# Altium PCB OmniCore_SDR.PcbDoc (part 1 of 13)
Units mil, origin at the board's own origin, x right, y up, seen from the top; angles counter-clockwise.
Board outline 4724.72 x 2755.91 mil, 8 copper layers (Top, GND 1, Layer 1, Layer 2, GND 2, Layer 3, Power, Bottom), stack 40.468 mil thick; 530 components, 427 nets, 2315 pads, 1715 vias.
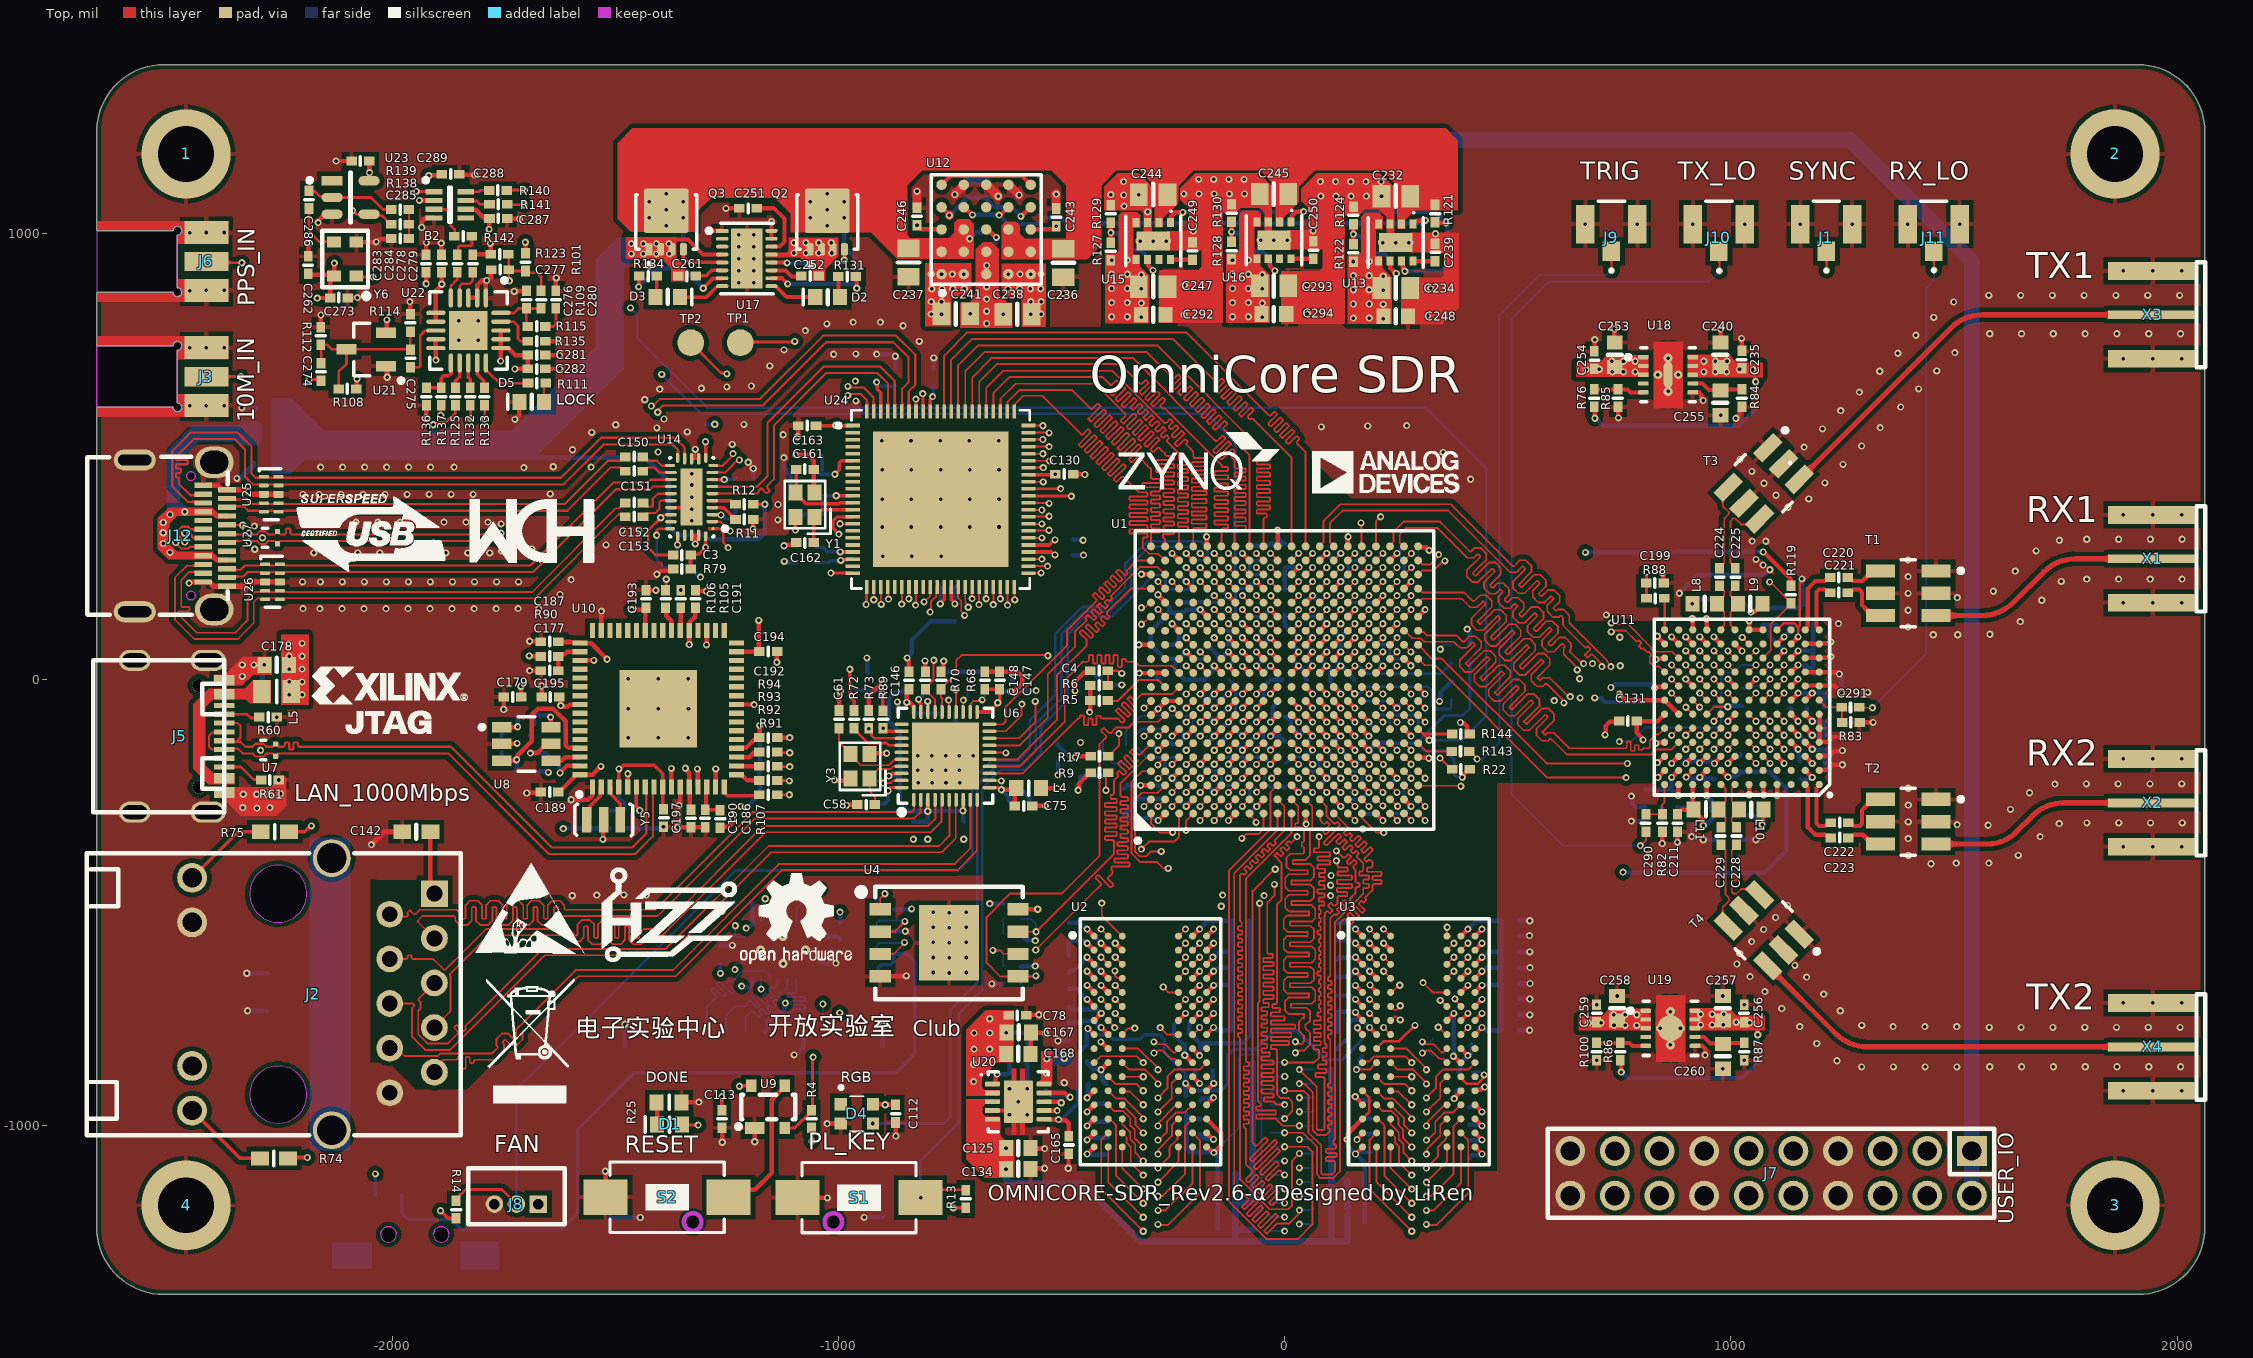
[diagram p0: Top view]
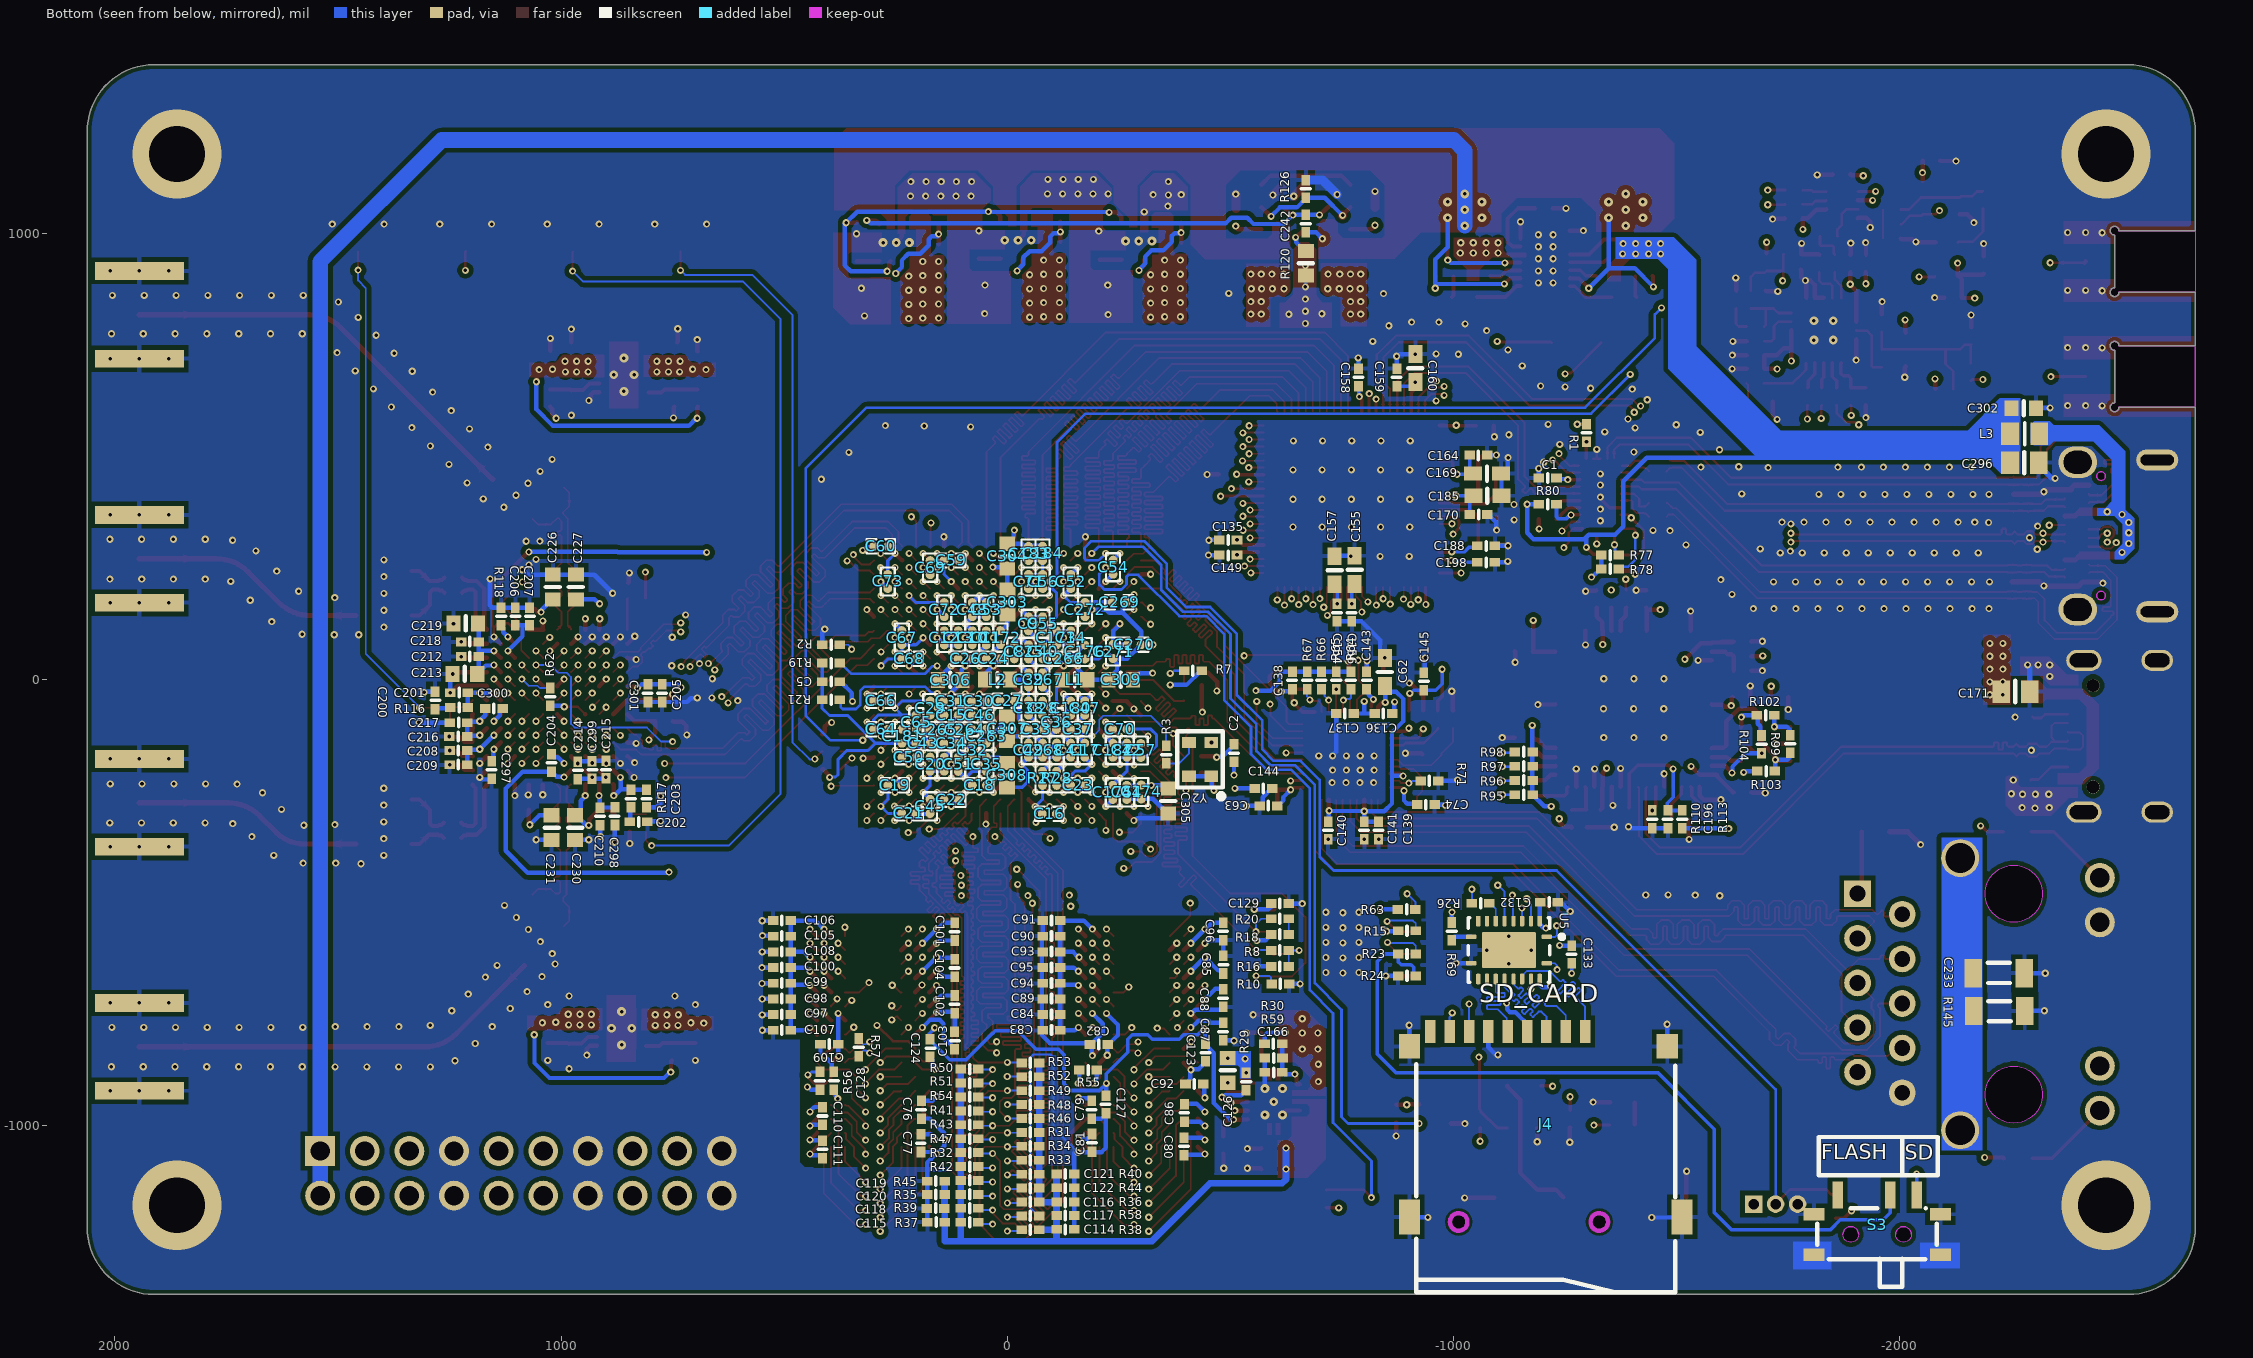
[diagram p1: Bottom view, seen from below]
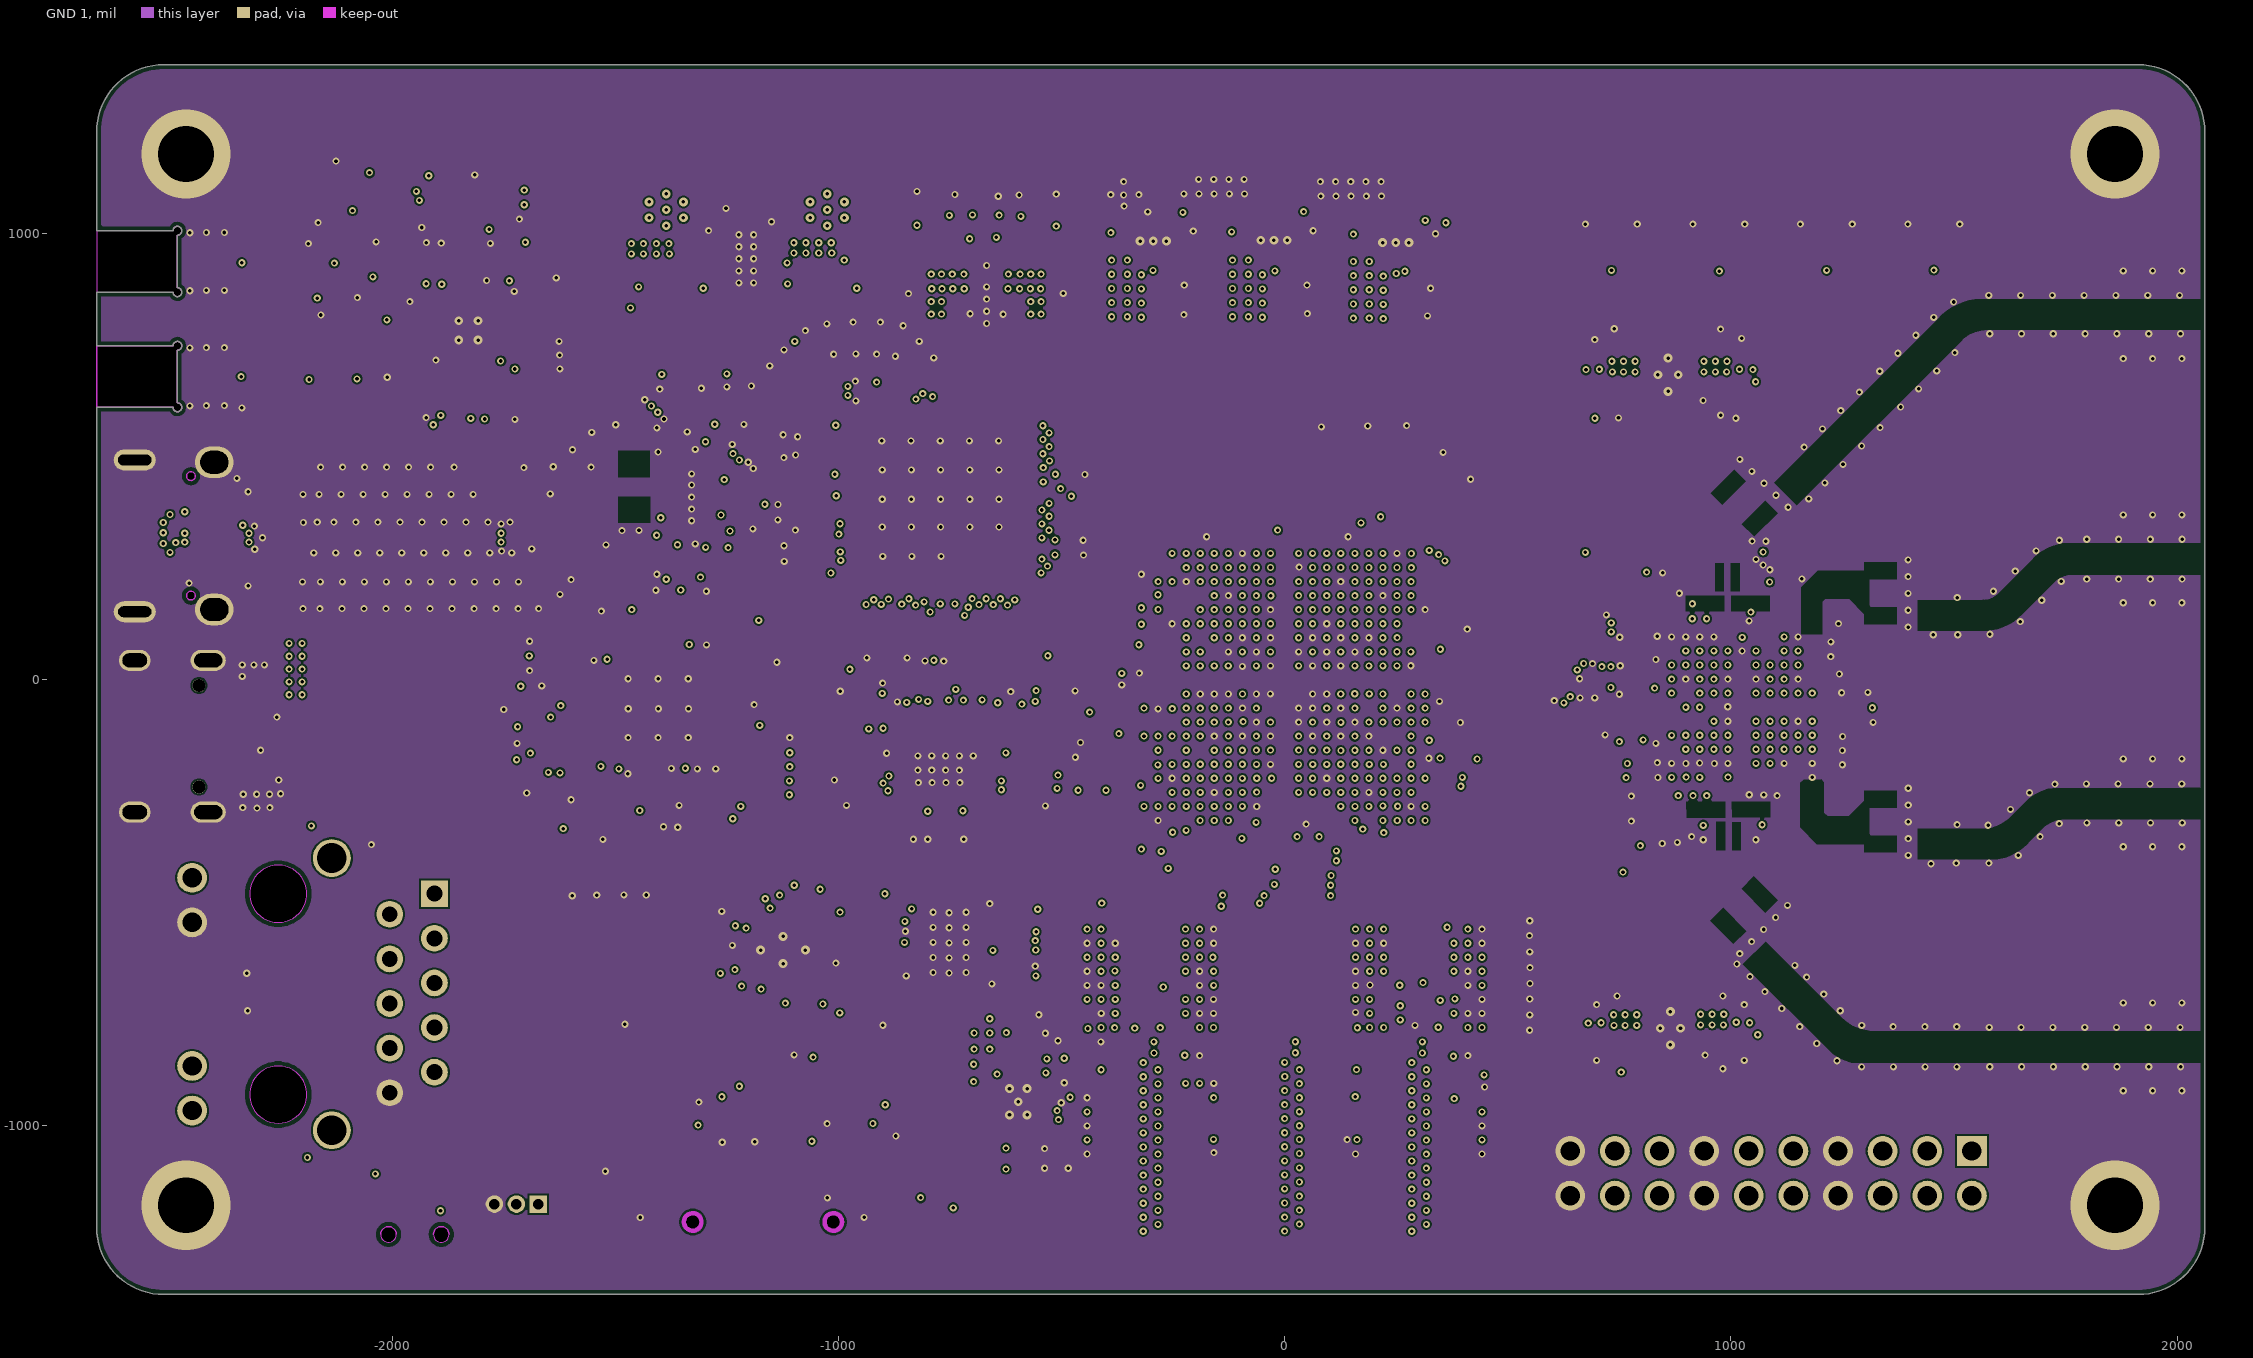
[diagram p2: GND 1]
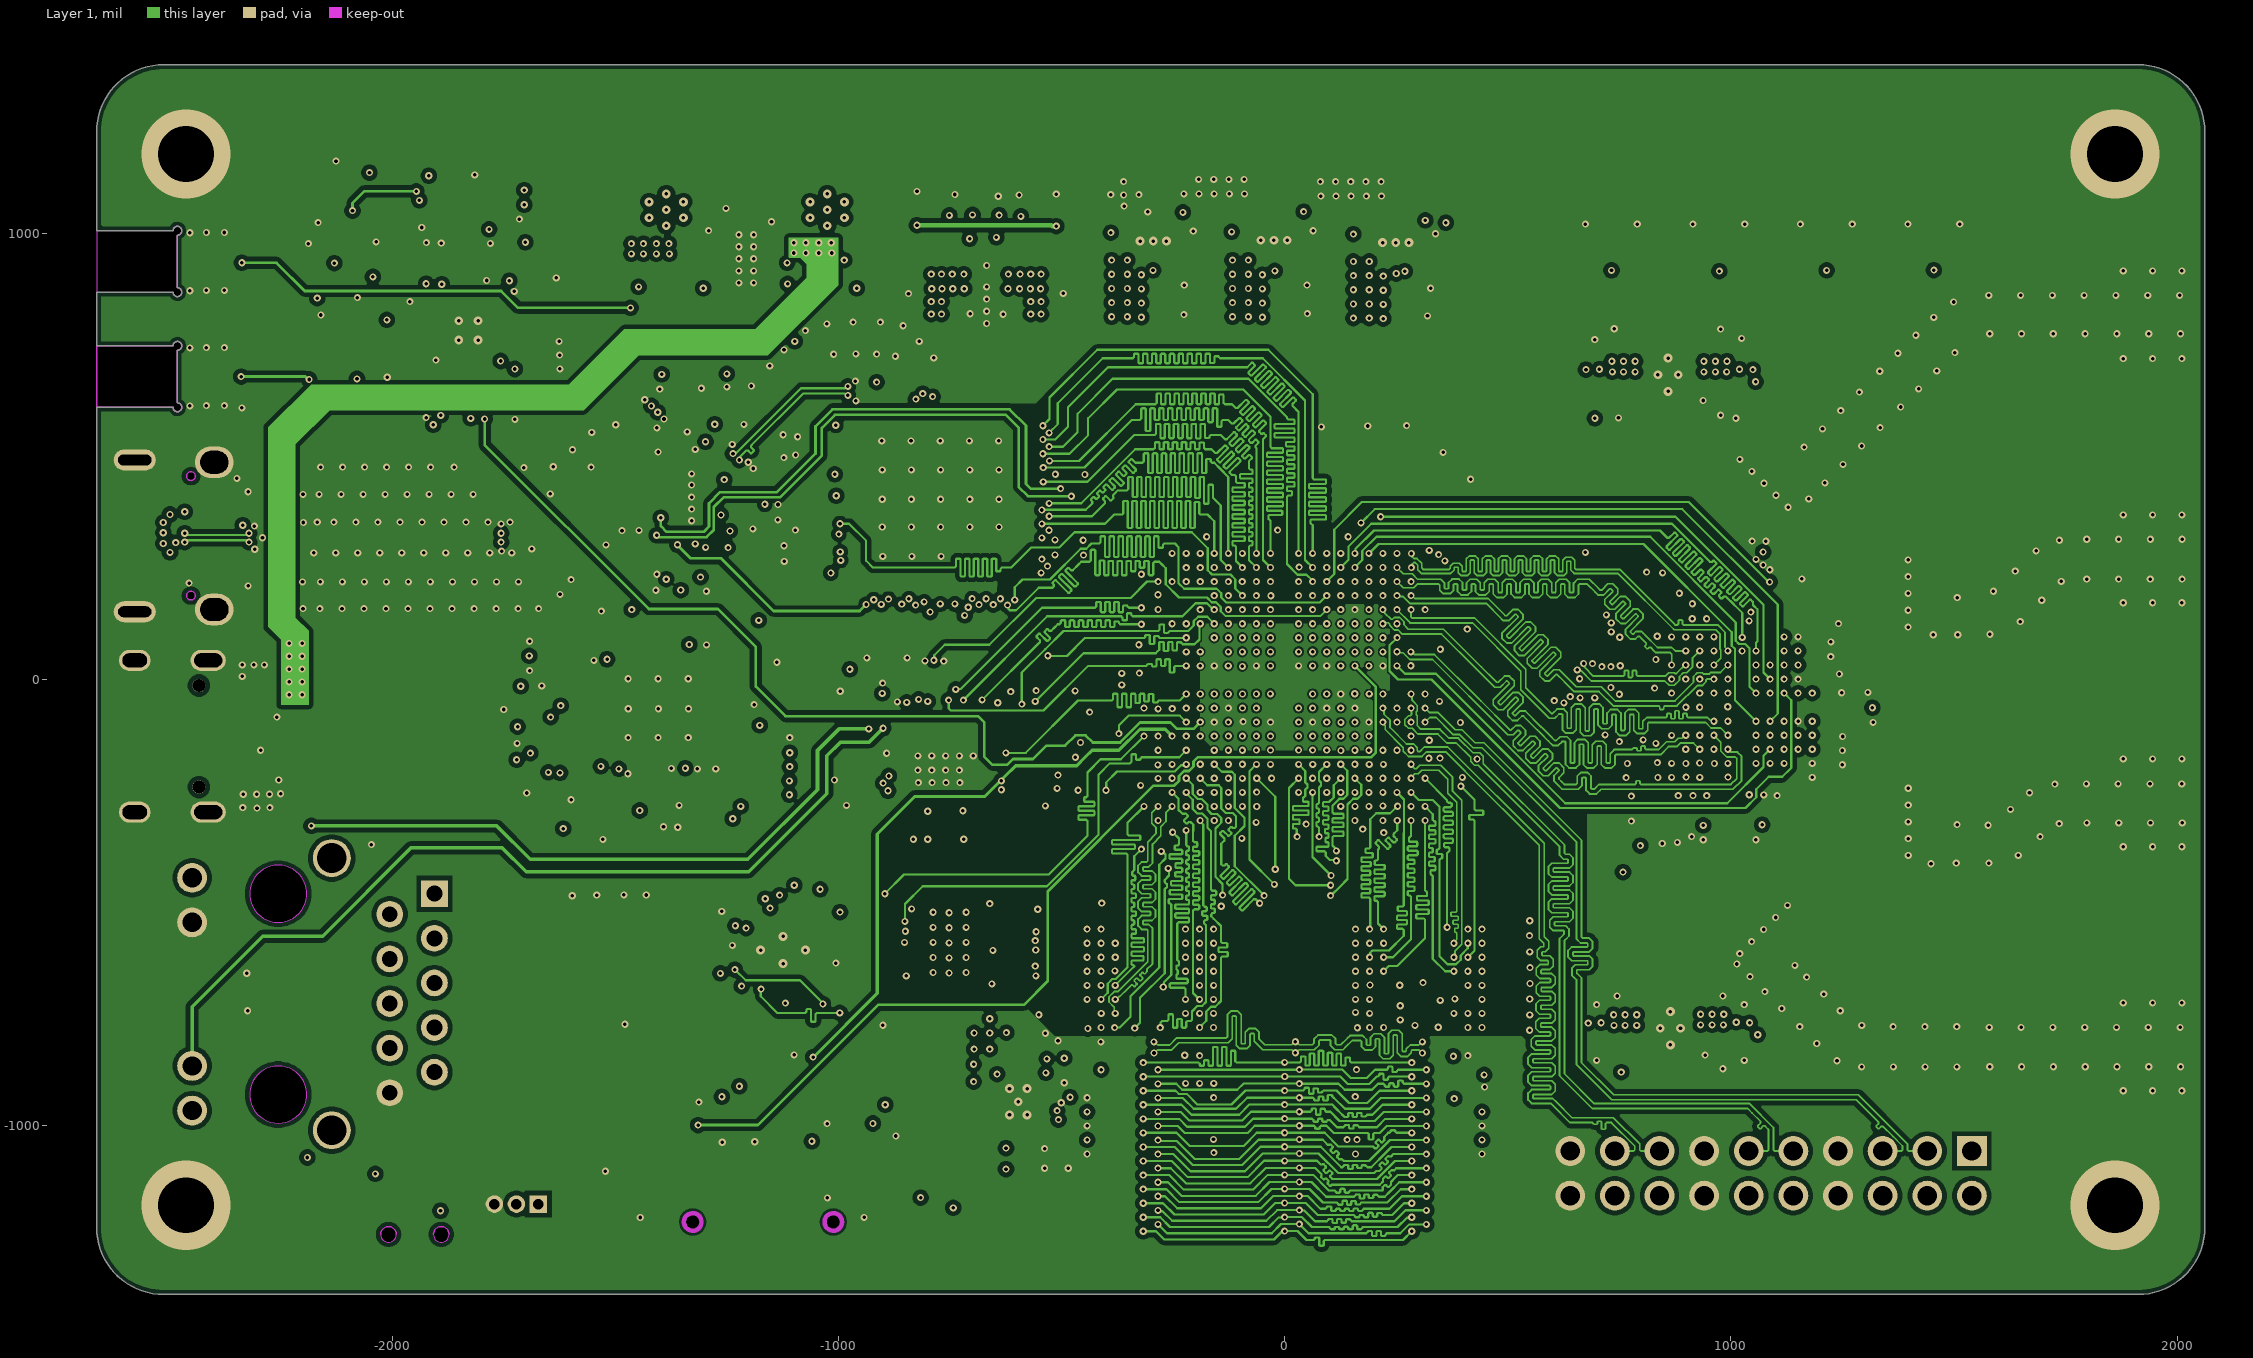
[diagram p3: Layer 1]
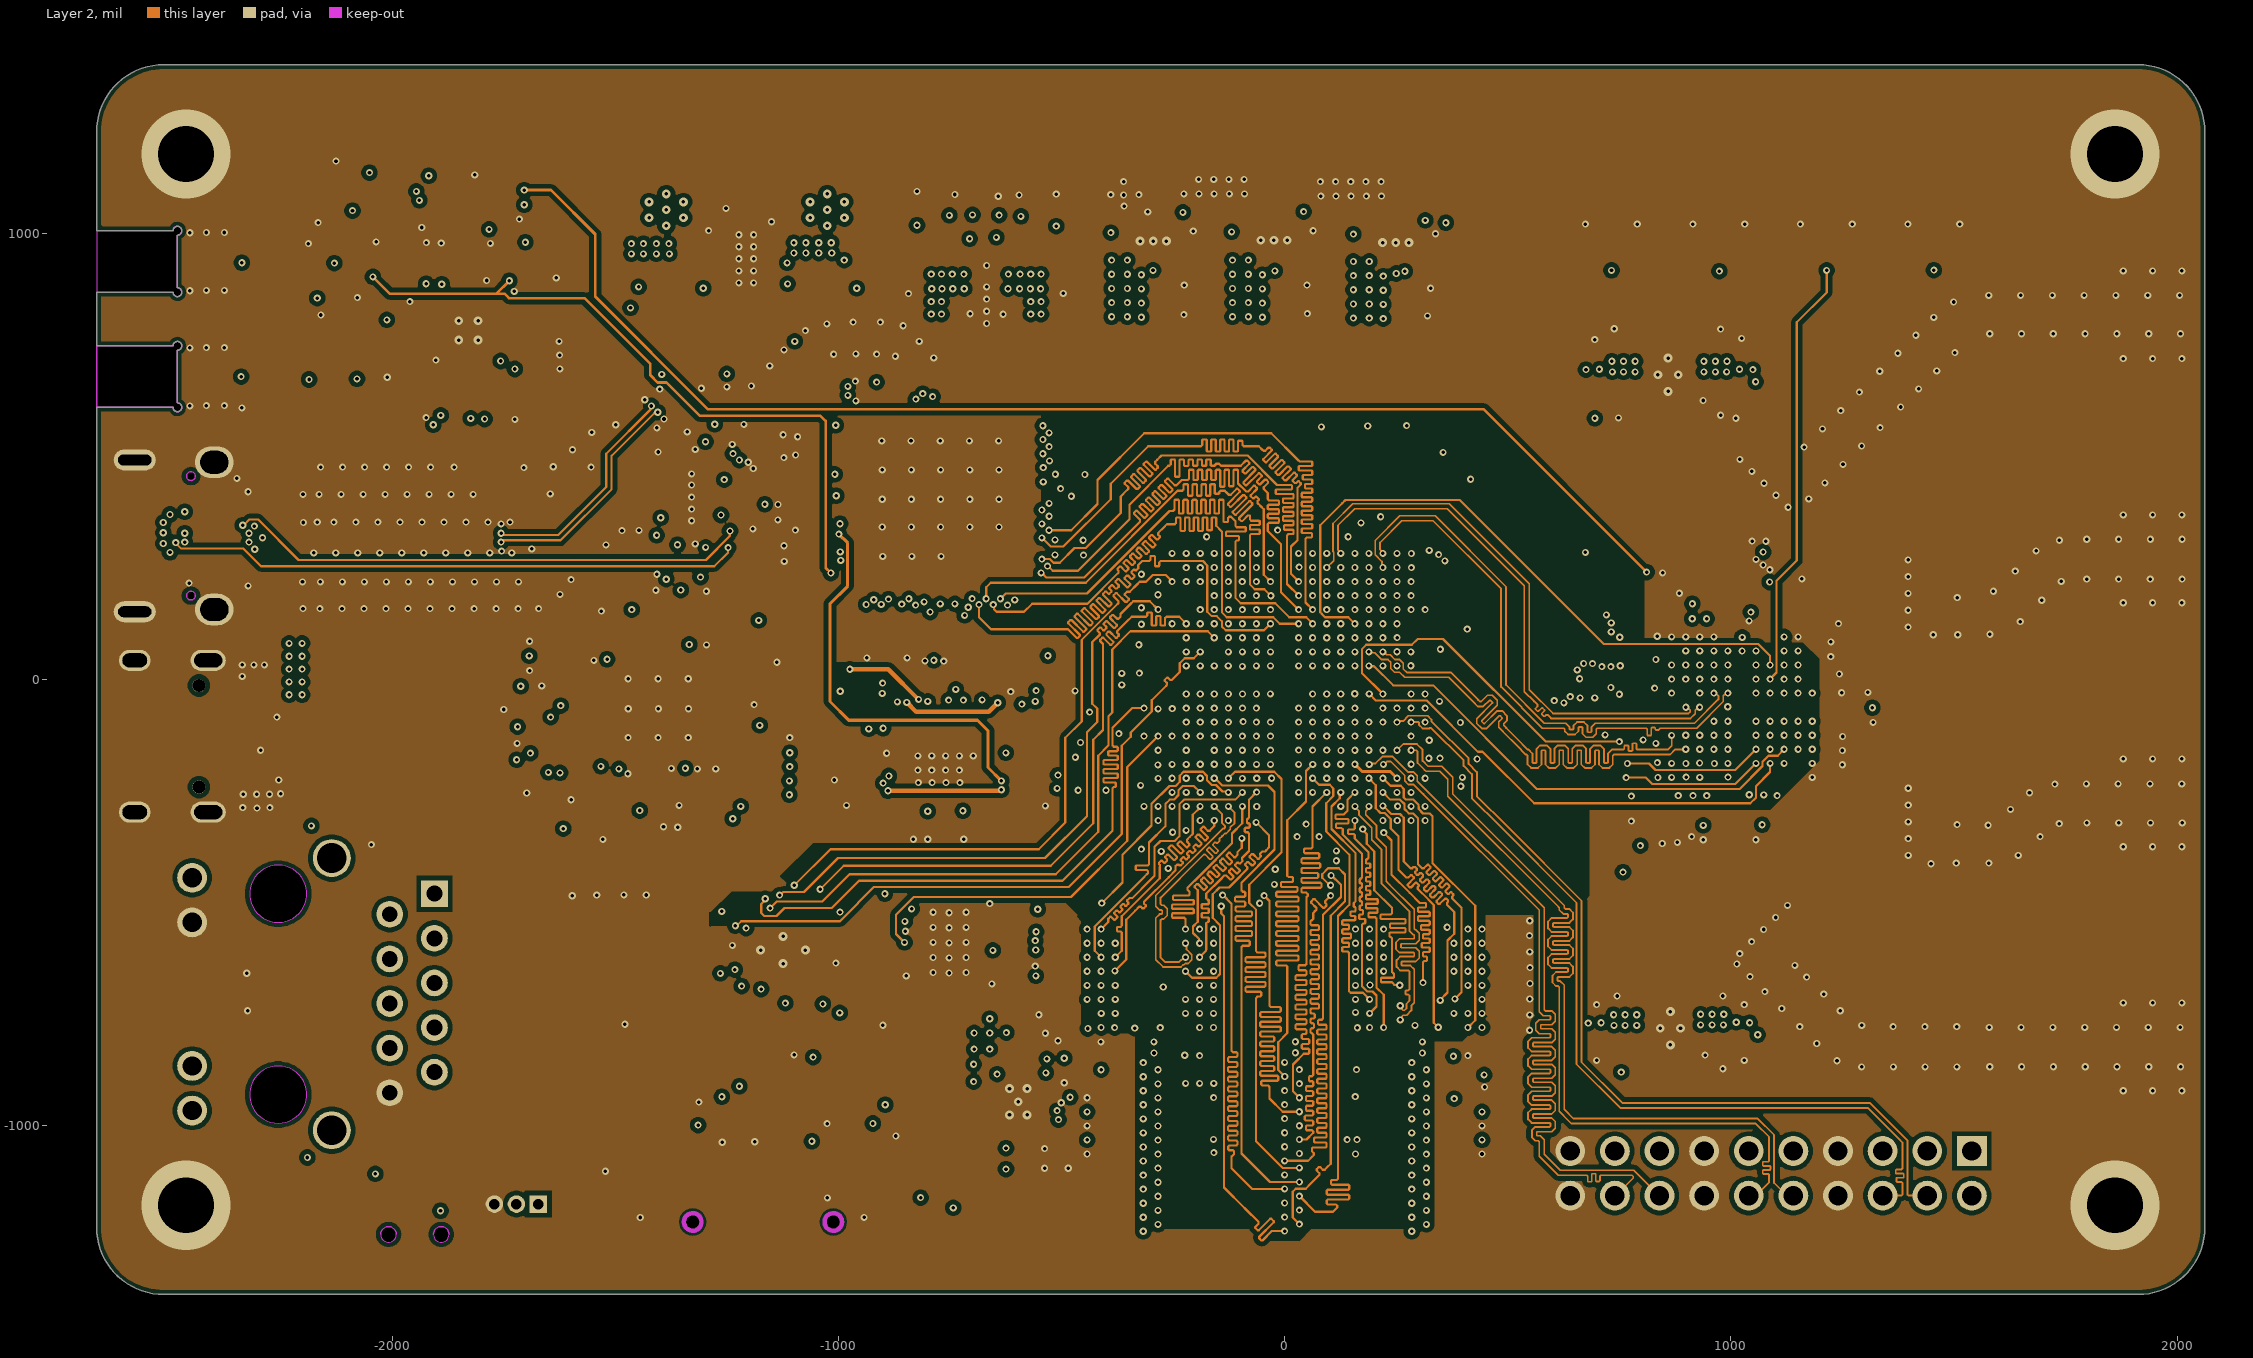
[diagram p4: Layer 2]
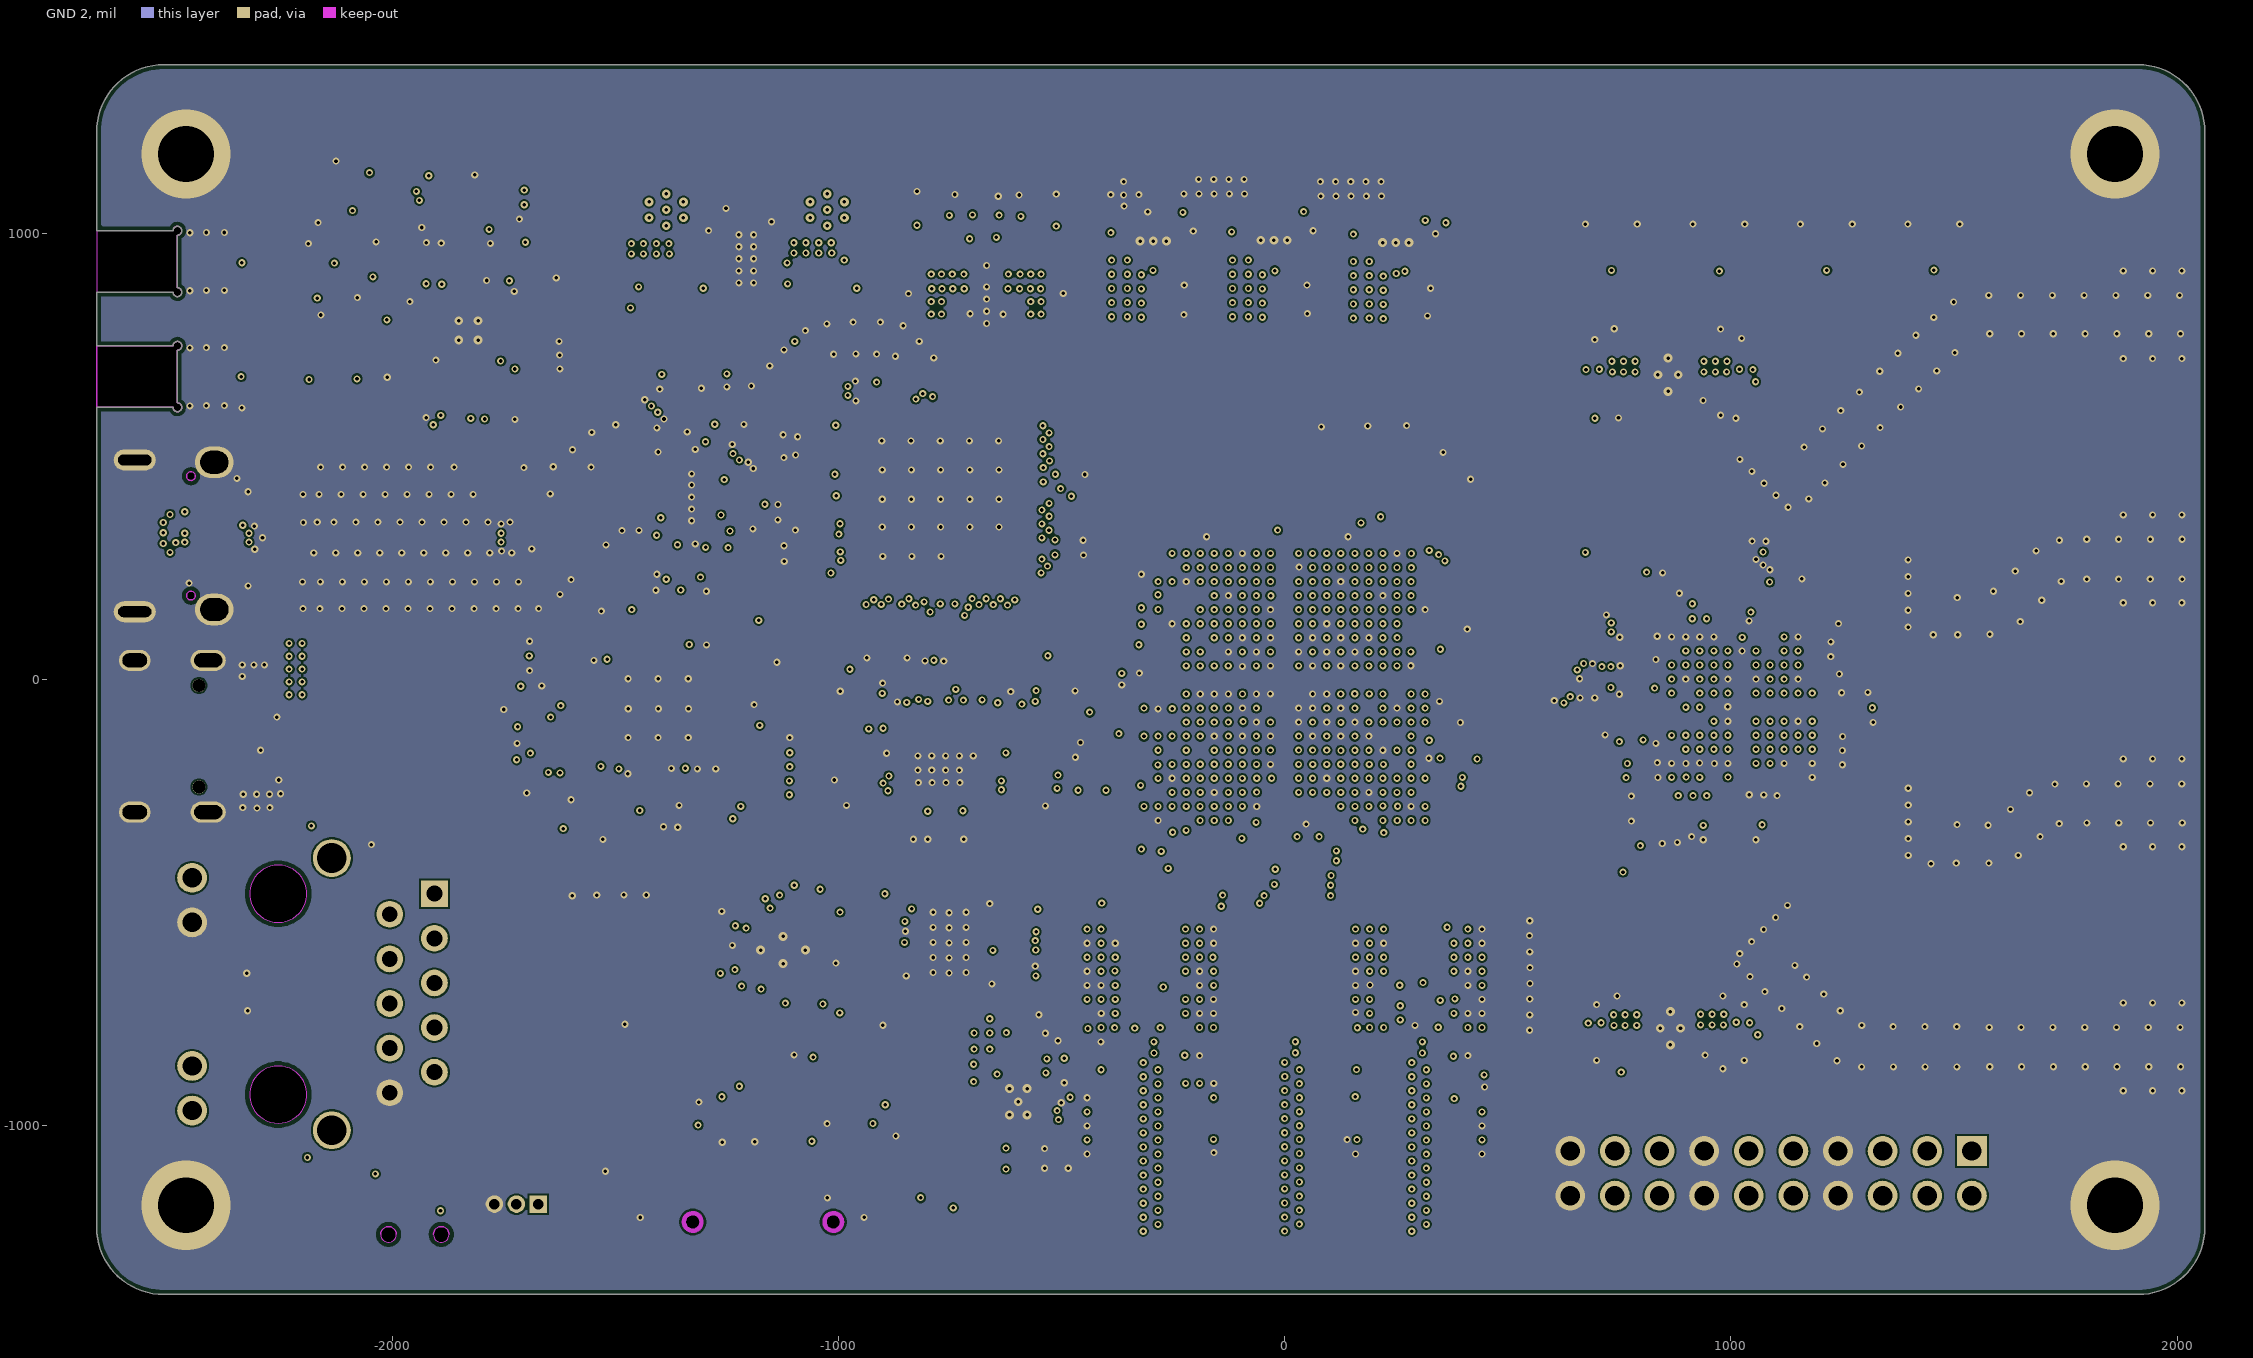
[diagram p5: GND 2]
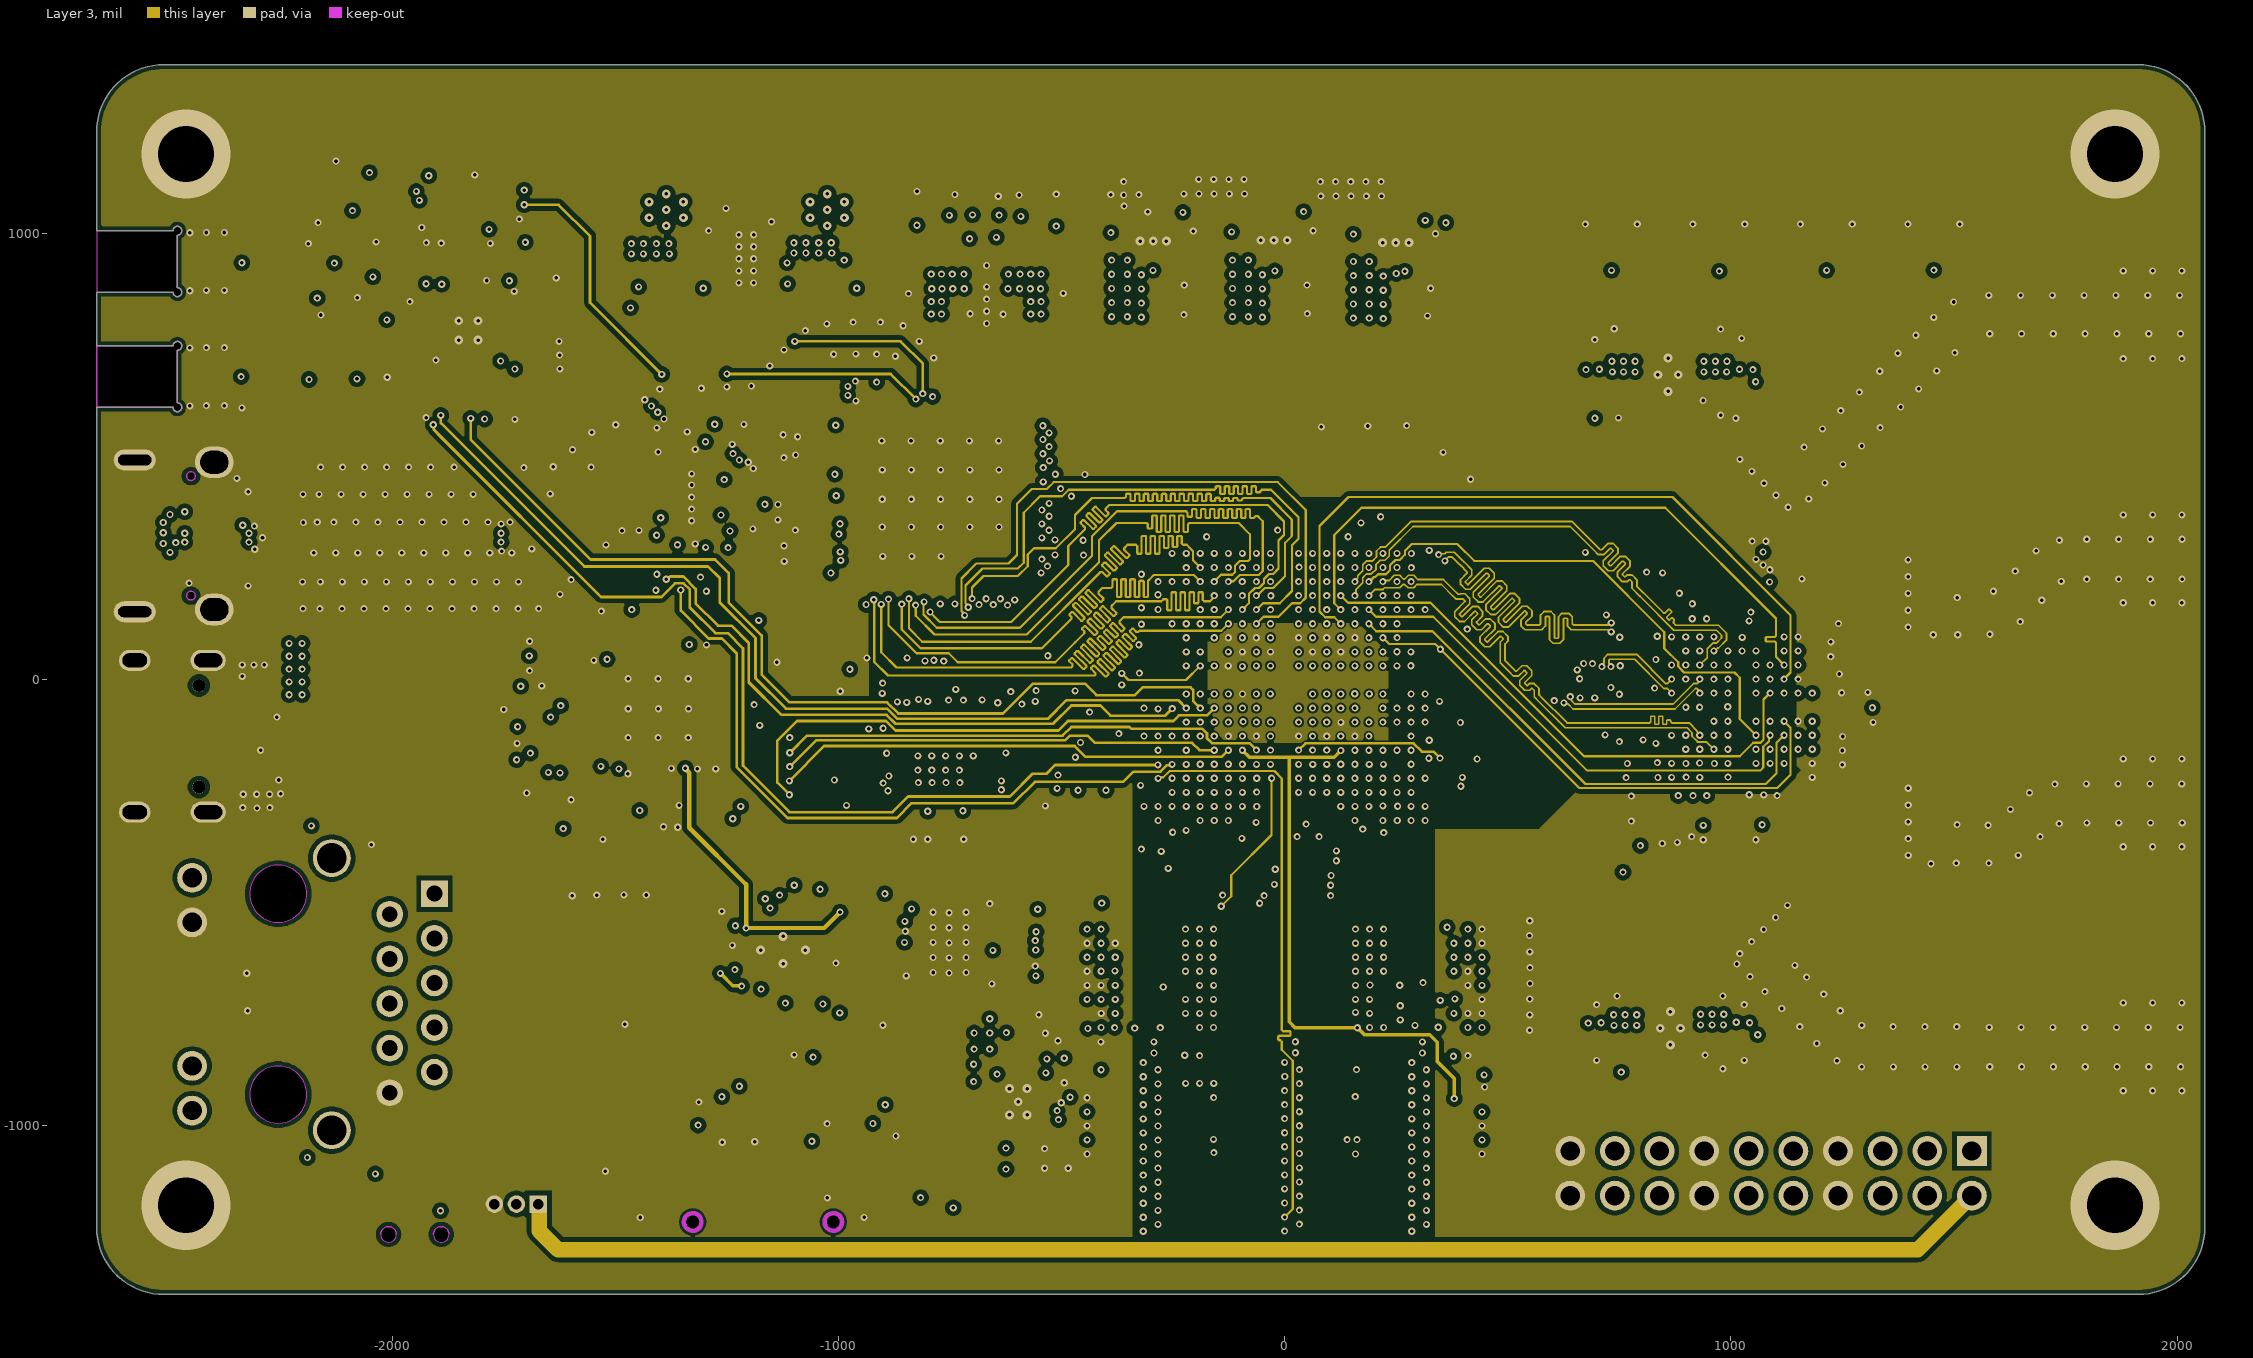
[diagram p6: Layer 3]
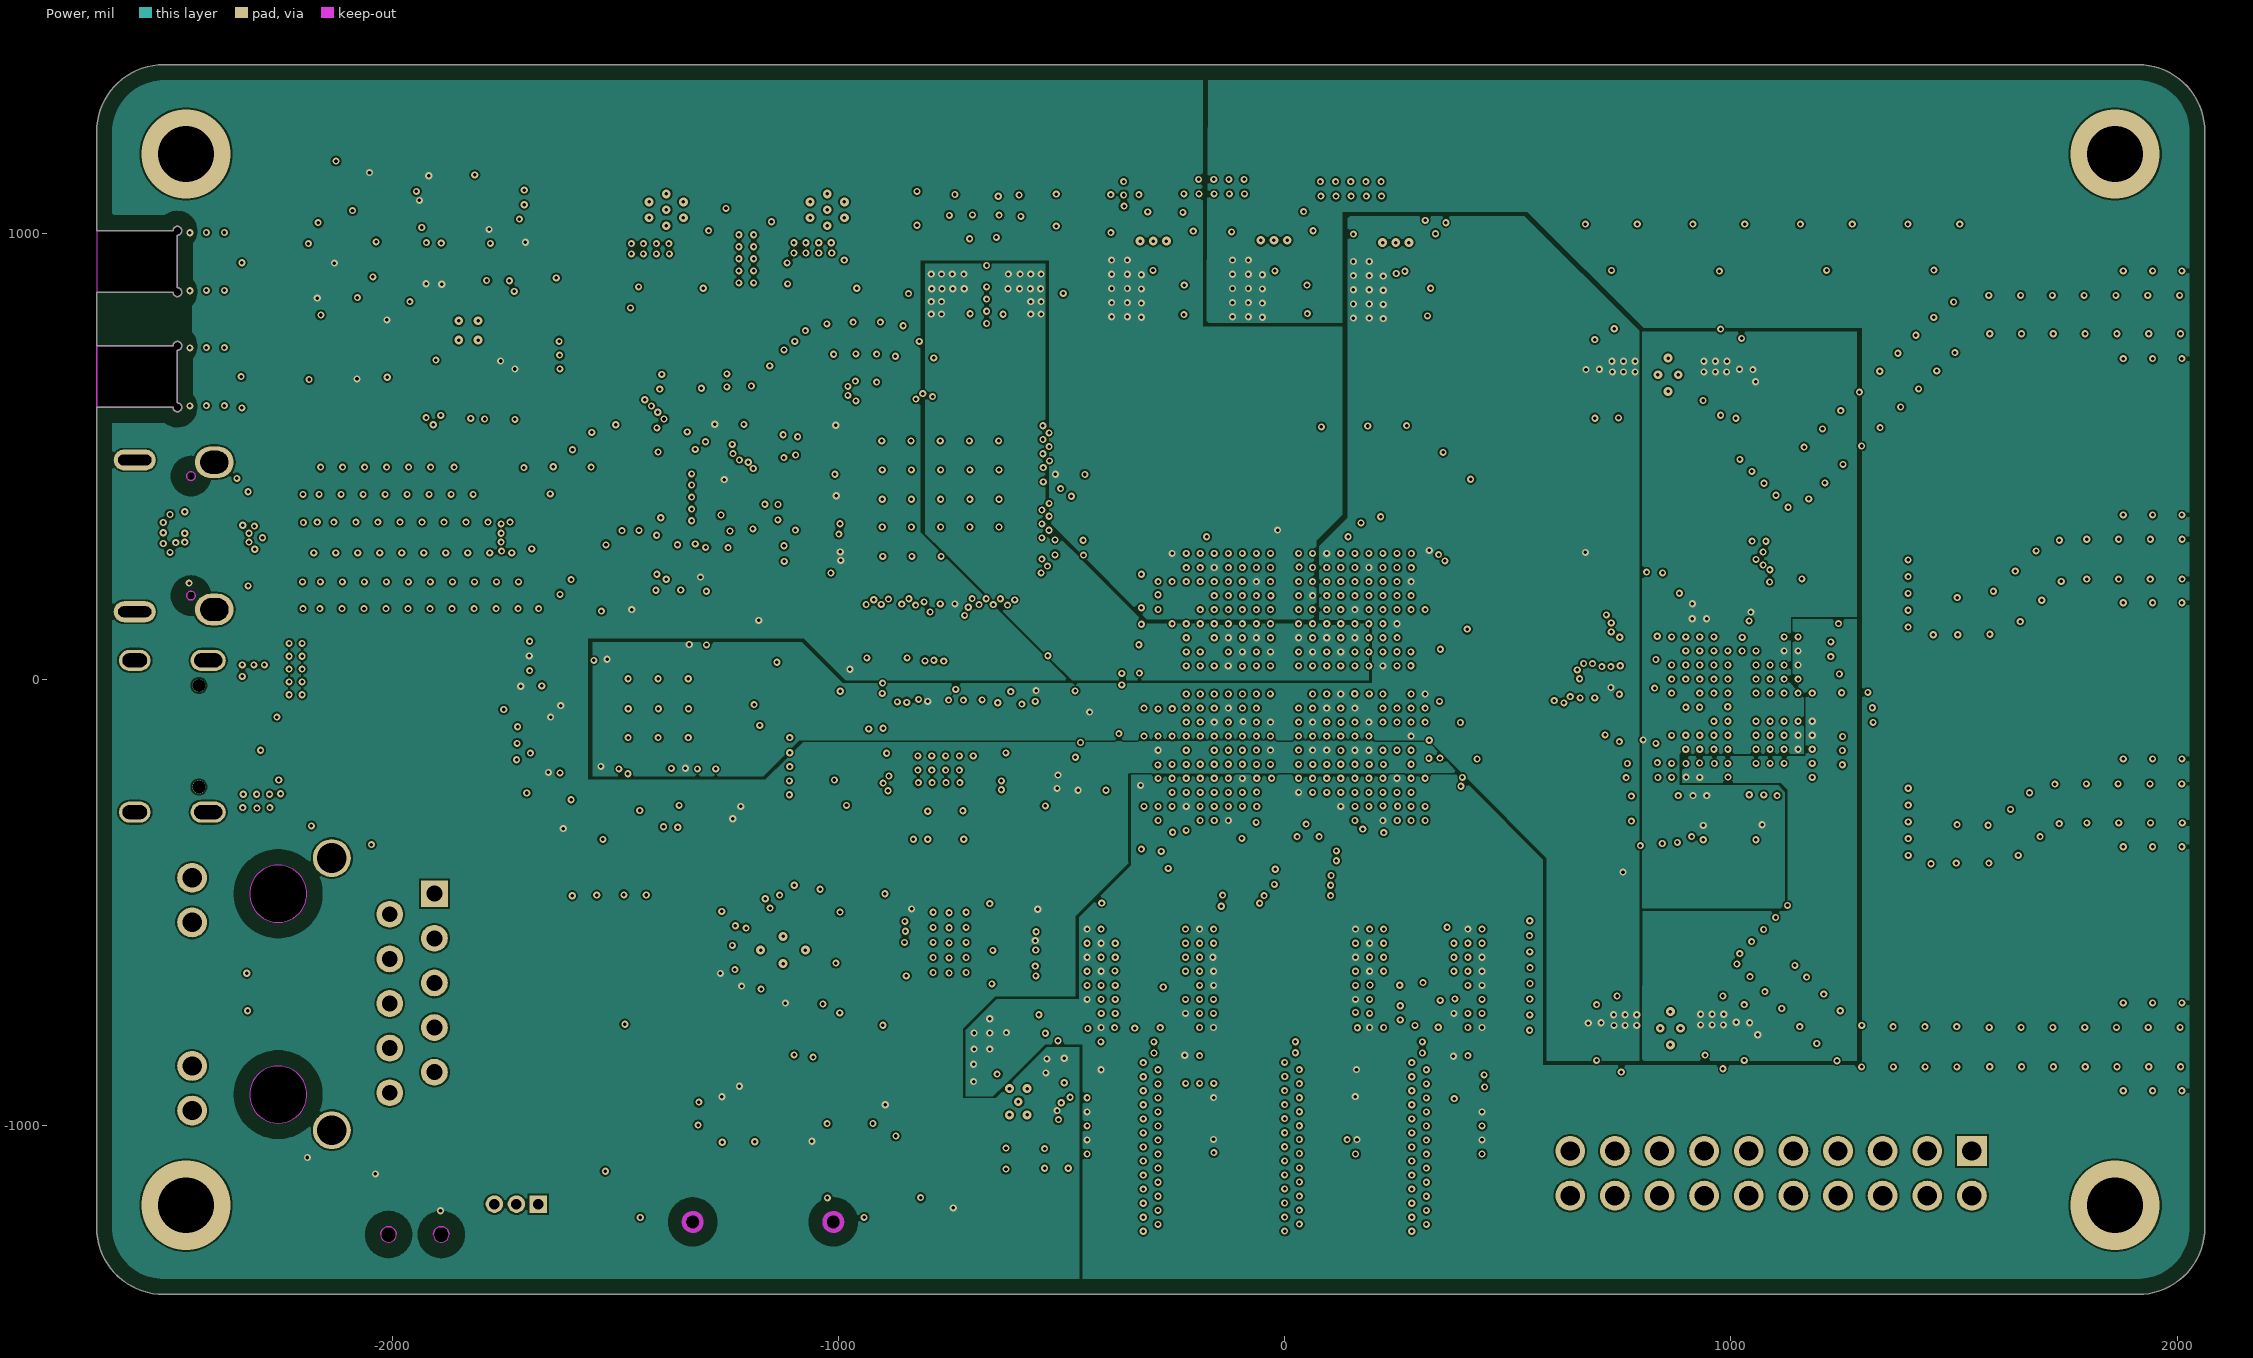
[diagram p7: Power]

## Layer stack, top to bottom
Top Solder: solder mask 0.4, Solder Resist, Dk 3.5
Top: signal copper 1.378
Dielectric 4: prepreg 2.8, PP-006, Dk 4.1
GND 1: signal copper 1.378
Dielectric 2: prepreg 2.8, PP-006, Dk 4.1
Layer 1: signal copper 1.378
Dielectric 6: prepreg 2.8, PP-006, Dk 4.1
Layer 2: signal copper 1.4
Dielectric 1: prepreg 12.6, FR-4, Dk 4.8
GND 2: signal copper 1.4
Dielectric 7: prepreg 2.8, PP-006, Dk 4.1
Layer 3: signal copper 1.378
Dielectric 3: prepreg 2.8, PP-006, Dk 4.1
Power: signal copper 1.378
Dielectric 5: prepreg 2.8, PP-006, Dk 4.1
Bottom: signal copper 1.378
Bottom Solder: solder mask 0.4, Solder Resist, Dk 3.5

## Board outline
-2662.2,-1227.95 -2662.2,610.12 -2491.26,610.12 ccw(c-2481.42,610.12) -2481.42,619.96 -2481.42,738.07 ccw(c-2481.42,747.91) -2491.26,747.91 -2662.2,747.91 -2662.2,868.11 -2491.26,868.11 ccw(c-2481.42,868.11) -2481.42,877.95 -2481.42,996.06 ccw(c-2481.42,1005.91) -2491.26,1005.91 -2662.52,1005.91 -2662.52,1227.95 -2662.2,1227.95 cw(c-2512.2,1227.95) -2512.2,1377.95 1912.2,1377.95 cw(c1912.2,1227.95) 2062.2,1227.95 2062.2,-1227.95 cw(c1912.2,-1227.95) 1912.2,-1377.95 -2512.2,-1377.95 cw(c-2512.2,-1227.95)
cut-out: -2662.52,610.12 -2662.52,747.91 -2491.26,747.91 cw(c-2481.42,747.91) -2481.42,738.07 -2481.42,619.96 cw(c-2481.42,610.12) -2491.26,610.12
cut-out: -2662.52,610.12 -2662.52,747.91 -2491.26,747.91 cw(c-2481.42,747.91) -2481.42,738.07 -2481.42,619.96 cw(c-2481.42,610.12) -2491.26,610.12

## Design rules (kind name [scope] priority, off if disabled: settings)
AssemblyTestpoint AssemblyTestpoint_1 [All] p1: testpointundercomponent=TRUE minsize=40 maxsize=100 preferedsize=60 minholesize=0 maxholesize=40 preferedholesize=32 testpointgrid=1 usegrid=TRUE gridtolerance=0.01 allowsidetop=TRUE allowsidebottom=TRUE
BoardOutlineClearance [OnLayer('Power')] p1: gap=35 ignorepadtopadclearanceinfootprint=FALSE
BoardOutlineClearance HZZ [All] p2: gap=10 ignorepadtopadclearanceinfootprint=FALSE
Clearance Clearance_9 [InNamedPolygon('GND_L06_P019')] p1: gap=10 ignorepadtopadclearanceinfootprint=FALSE
Clearance Clearance_8 [InNamedPolygon('GND_L04_P018')] p2: gap=10 ignorepadtopadclearanceinfootprint=FALSE
Clearance Clearance_7 [InNamedPolygon('GND_L03_P017')] p3: gap=10 ignorepadtopadclearanceinfootprint=FALSE
Clearance Clearance_6 [InNamedPolygon('GND_L06_P019')] p4: gap=10 ignorepadtopadclearanceinfootprint=FALSE
Clearance Clearance_5 [InNamedPolygon('GND_L04_P018')] p5: gap=10 ignorepadtopadclearanceinfootprint=FALSE
Clearance Clearance_4 [InNamedPolygon('GND_L03_P017')] p6: gap=10 ignorepadtopadclearanceinfootprint=FALSE
Clearance Clearance_3 [InNamedPolygon('GND_L08_P016')] p7: gap=10 ignorepadtopadclearanceinfootprint=FALSE
Clearance Clearance_2 [InNamedPolygon('GND_L01_P015')] p8: gap=10 ignorepadtopadclearanceinfootprint=FALSE
Clearance Clearance_1 [InComponent('J3') Or InComponent('J6')] p9: gap=0 ignorepadtopadclearanceinfootprint=TRUE
Clearance [All] p10: gap=4 ignorepadtopadclearanceinfootprint=FALSE
DiffPairsRouting DiffPair_DiffPairsRouting [All] p1: maxlimit=100 minlimit=4 mostfreqgap=7 toplayer_prefgap=10 toplayer_minwidth=4 toplayer_maxwidth=15 toplayer_prefwidth=4 midlayer1_minwidth=4 midlayer1_maxwidth=15 midlayer1_prefwidth=4 midlayer2_minwidth=4 midlayer2_maxwidth=15 midlayer2_prefwidth=4 midlayer3_minwidth=4 midlayer3_maxwidth=15 midlayer3_prefwidth=4 midlayer4_minwidth=4 midlayer4_maxwidth=15 midlayer4_prefwidth=4 midlayer5_minwidth=4 midlayer5_maxwidth=15 midlayer5_prefwidth=4 midlayer6_minwidth=4 midlayer6_maxwidth=15 midlayer6_prefwidth=4 bottomlayer_prefgap=10 bottomlayer_minwidth=4 bottomlayer_maxwidth=15 bottomlayer_prefwidth=4 maxuncoupledlength=40
FanoutControl Fanout_BGA [All] p1: bgadir=Out bgaviamode=Centered fanoutstyle=BGA fanoutdirection=Alternating viagrid=1 // Fanout_BGA (Default Rule)
Height [All] p1: minheight=0 maxheight=5000 prefheight=500
HoleSize [All] p1: absolutevalues=TRUE maxlimit=200 minlimit=6 maxpercent=80.000 minpercent=20.000
HoleToHoleClearance [All] p1: gap=6 allowstackedmicrovias=TRUE
MatchedLengths MatchedLengths_5 [InNetClass('AD9361_RF')] p1: tolerance=40 checknetsindiffpair=TRUE checkdiffpairvsdiffpair=FALSE checkxsignals=FALSE checkothers=FALSE
MatchedLengths MatchedLengths_2 [InNetClass('DDR_D4')] p2: tolerance=5 checknetsindiffpair=FALSE checkdiffpairvsdiffpair=TRUE checkxsignals=TRUE checkothers=TRUE
MatchedLengths MatchedLengths_4 [InNetClass('DDR_D3')] p3: tolerance=5 checknetsindiffpair=FALSE checkdiffpairvsdiffpair=TRUE checkxsignals=TRUE checkothers=TRUE
MatchedLengths MatchedLengths_3 [InNetClass('DDR_D2')] p4: tolerance=5 checknetsindiffpair=FALSE checkdiffpairvsdiffpair=TRUE checkxsignals=TRUE checkothers=TRUE
MatchedLengths MatchedLengths_1 [InNetClass('DDR_D1')] p5: tolerance=5 checknetsindiffpair=FALSE checkdiffpairvsdiffpair=TRUE checkxsignals=TRUE checkothers=TRUE
MatchedLengths [InxSignalClass('All xSignals')] p6: tolerance=10 checknetsindiffpair=FALSE checkdiffpairvsdiffpair=TRUE checkxsignals=TRUE checkothers=TRUE targetsourcename=DDR3_A3_PP1
MatchedLengths DiffPair_MatchedLengths [Not InNetClass('AD9361_RF')] p7: tolerance=5 checknetsindiffpair=TRUE checkdiffpairvsdiffpair=FALSE checkxsignals=FALSE checkothers=FALSE
MinimumSolderMaskSliver [All] p1: minsoldermaskwidth=0
PlaneConnect PlaneConnect_1 [All] p1: planeconnectstyle=Relief reliefexpansion=20 reliefentries=4 reliefconductorwidth=10 reliefairgap=10
PolygonConnect PolygonConnect_22 [All vs IsNamedPolygon('GND_L05_P013')] p1: thpad.connectstyle=Direct thpad.reliefconductorwidth=10 thpad.reliefentries=4 thpad.polygonreliefangle="90 Angle" thpad.airgapwidth=10 smdpad.connectstyle=Relief smdpad.reliefconductorwidth=10 smdpad.reliefentries=4 smdpad.polygonreliefangle="90 Angle" smdpad.airgapwidth=10 via.connectstyle=Direct via.reliefconductorwidth=10 via.reliefentries=4 via.polygonreliefangle="90 Angle" via.airgapwidth=10
PolygonConnect PolygonConnect_21 [All vs IsNamedPolygon('GND_L03_P017')] p2: thpad.connectstyle=Direct thpad.reliefconductorwidth=10 thpad.reliefentries=4 thpad.polygonreliefangle="90 Angle" thpad.airgapwidth=10 smdpad.connectstyle=Relief smdpad.reliefconductorwidth=10 smdpad.reliefentries=4 smdpad.polygonreliefangle="90 Angle" smdpad.airgapwidth=10 via.connectstyle=Direct via.reliefconductorwidth=10 via.reliefentries=4 via.polygonreliefangle="90 Angle" via.airgapwidth=10
PolygonConnect PolygonConnect_20 [All vs IsNamedPolygon('GND_L04_P018')] p3: thpad.connectstyle=Direct thpad.reliefconductorwidth=10 thpad.reliefentries=4 thpad.polygonreliefangle="90 Angle" thpad.airgapwidth=10 smdpad.connectstyle=Relief smdpad.reliefconductorwidth=10 smdpad.reliefentries=4 smdpad.polygonreliefangle="90 Angle" smdpad.airgapwidth=10 via.connectstyle=Direct via.reliefconductorwidth=10 via.reliefentries=4 via.polygonreliefangle="90 Angle" via.airgapwidth=10
PolygonConnect PolygonConnect_19 [All vs IsNamedPolygon('GND_L06_P019')] p4: thpad.connectstyle=Direct thpad.reliefconductorwidth=10 thpad.reliefentries=4 thpad.polygonreliefangle="90 Angle" thpad.airgapwidth=10 smdpad.connectstyle=Relief smdpad.reliefconductorwidth=10 smdpad.reliefentries=4 smdpad.polygonreliefangle="90 Angle" smdpad.airgapwidth=10 via.connectstyle=Direct via.reliefconductorwidth=10 via.reliefentries=4 via.polygonreliefangle="90 Angle" via.airgapwidth=10
PolygonConnect PolygonConnect_18 [All vs IsNamedPolygon('GND_L06_P019')] p5: thpad.connectstyle=Direct thpad.reliefconductorwidth=10 thpad.reliefentries=4 thpad.polygonreliefangle="90 Angle" thpad.airgapwidth=10 smdpad.connectstyle=Relief smdpad.reliefconductorwidth=10 smdpad.reliefentries=4 smdpad.polygonreliefangle="90 Angle" smdpad.airgapwidth=10 via.connectstyle=Direct via.reliefconductorwidth=10 via.reliefentries=4 via.polygonreliefangle="90 Angle" via.airgapwidth=10
PolygonConnect PolygonConnect_17 [All vs IsNamedPolygon('GND_L04_P018')] p6: thpad.connectstyle=Direct thpad.reliefconductorwidth=10 thpad.reliefentries=4 thpad.polygonreliefangle="90 Angle" thpad.airgapwidth=10 smdpad.connectstyle=Relief smdpad.reliefconductorwidth=10 smdpad.reliefentries=4 smdpad.polygonreliefangle="90 Angle" smdpad.airgapwidth=10 via.connectstyle=Direct via.reliefconductorwidth=10 via.reliefentries=4 via.polygonreliefangle="90 Angle" via.airgapwidth=10
PolygonConnect PolygonConnect_16 [All vs IsNamedPolygon('GND_L03_P017')] p7: thpad.connectstyle=Direct thpad.reliefconductorwidth=10 thpad.reliefentries=4 thpad.polygonreliefangle="90 Angle" thpad.airgapwidth=10 smdpad.connectstyle=Relief smdpad.reliefconductorwidth=10 smdpad.reliefentries=4 smdpad.polygonreliefangle="90 Angle" smdpad.airgapwidth=10 via.connectstyle=Direct via.reliefconductorwidth=10 via.reliefentries=4 via.polygonreliefangle="90 Angle" via.airgapwidth=10
PolygonConnect PolygonConnect_15 [All vs IsNamedPolygon('GND_L08_P016')] p8: thpad.connectstyle=Direct thpad.reliefconductorwidth=10 thpad.reliefentries=4 thpad.polygonreliefangle="90 Angle" thpad.airgapwidth=10 smdpad.connectstyle=Relief smdpad.reliefconductorwidth=10 smdpad.reliefentries=4 smdpad.polygonreliefangle="90 Angle" smdpad.airgapwidth=10 via.connectstyle=Direct via.reliefconductorwidth=10 via.reliefentries=4 via.polygonreliefangle="90 Angle" via.airgapwidth=10
PolygonConnect PolygonConnect_14 [All vs IsNamedPolygon('GND_L01_P015')] p9: thpad.connectstyle=Direct thpad.reliefconductorwidth=10 thpad.reliefentries=4 thpad.polygonreliefangle="90 Angle" thpad.airgapwidth=10 smdpad.connectstyle=Relief smdpad.reliefconductorwidth=10 smdpad.reliefentries=4 smdpad.polygonreliefangle="90 Angle" smdpad.airgapwidth=10 via.connectstyle=Direct via.reliefconductorwidth=10 via.reliefentries=4 via.polygonreliefangle="90 Angle" via.airgapwidth=10
PolygonConnect PolygonConnect_13 [All vs IsNamedPolygon('GND_L05_P013')] p10: thpad.connectstyle=Direct thpad.reliefconductorwidth=10 thpad.reliefentries=4 thpad.polygonreliefangle="90 Angle" thpad.airgapwidth=10 smdpad.connectstyle=Direct smdpad.reliefconductorwidth=10 smdpad.reliefentries=4 smdpad.polygonreliefangle="90 Angle" smdpad.airgapwidth=10 via.connectstyle=Relief via.reliefconductorwidth=10 via.reliefentries=4 via.polygonreliefangle="90 Angle" via.airgapwidth=10
PolygonConnect PolygonConnect_12 [All vs IsNamedPolygon('GND_L02_P014')] p11: thpad.connectstyle=Direct thpad.reliefconductorwidth=10 thpad.reliefentries=4 thpad.polygonreliefangle="90 Angle" thpad.airgapwidth=10 smdpad.connectstyle=Relief smdpad.reliefconductorwidth=10 smdpad.reliefentries=4 smdpad.polygonreliefangle="90 Angle" smdpad.airgapwidth=10 via.connectstyle=Direct via.reliefconductorwidth=10 via.reliefentries=4 via.polygonreliefangle="90 Angle" via.airgapwidth=10
PolygonConnect PolygonConnect_11 [All vs IsNamedPolygon('3V3_L04_P012')] p12: thpad.connectstyle=Direct thpad.reliefconductorwidth=10 thpad.reliefentries=4 thpad.polygonreliefangle="90 Angle" thpad.airgapwidth=10 smdpad.connectstyle=Relief smdpad.reliefconductorwidth=10 smdpad.reliefentries=4 smdpad.polygonreliefangle="90 Angle" smdpad.airgapwidth=10 via.connectstyle=Direct via.reliefconductorwidth=10 via.reliefentries=4 via.polygonreliefangle="90 Angle" via.airgapwidth=10
PolygonConnect PolygonConnect_10 [All vs IsNamedPolygon('3V3_L07_P011')] p13: thpad.connectstyle=Direct thpad.reliefconductorwidth=10 thpad.reliefentries=4 thpad.polygonreliefangle="90 Angle" thpad.airgapwidth=10 smdpad.connectstyle=Relief smdpad.reliefconductorwidth=10 smdpad.reliefentries=4 smdpad.polygonreliefangle="90 Angle" smdpad.airgapwidth=10 via.connectstyle=Direct via.reliefconductorwidth=10 via.reliefentries=4 via.polygonreliefangle="90 Angle" via.airgapwidth=10
PolygonConnect PolygonConnect_9 [All vs IsNamedPolygon('1V35_L07_P010')] p14: thpad.connectstyle=Direct thpad.reliefconductorwidth=10 thpad.reliefentries=4 thpad.polygonreliefangle="90 Angle" thpad.airgapwidth=10 smdpad.connectstyle=Relief smdpad.reliefconductorwidth=10 smdpad.reliefentries=4 smdpad.polygonreliefangle="90 Angle" smdpad.airgapwidth=10 via.connectstyle=Direct via.reliefconductorwidth=10 via.reliefentries=4 via.polygonreliefangle="90 Angle" via.airgapwidth=10
PolygonConnect PolygonConnect_8 [All vs IsNamedPolygon('VDD_DIG_L07_P006')] p15: thpad.connectstyle=Direct thpad.reliefconductorwidth=10 thpad.reliefentries=4 thpad.polygonreliefangle="90 Angle" thpad.airgapwidth=10 smdpad.connectstyle=Relief smdpad.reliefconductorwidth=10 smdpad.reliefentries=4 smdpad.polygonreliefangle="90 Angle" smdpad.airgapwidth=10 via.connectstyle=Direct via.reliefconductorwidth=10 via.reliefentries=4 via.polygonreliefangle="90 Angle" via.airgapwidth=10
PolygonConnect PolygonConnect_7 [All vs IsNamedPolygon('VDDA_RX_LO_L07_P004')] p16: thpad.connectstyle=Direct thpad.reliefconductorwidth=10 thpad.reliefentries=4 thpad.polygonreliefangle="90 Angle" thpad.airgapwidth=10 smdpad.connectstyle=Relief smdpad.reliefconductorwidth=10 smdpad.reliefentries=4 smdpad.polygonreliefangle="90 Angle" smdpad.airgapwidth=10 via.connectstyle=Direct via.reliefconductorwidth=10 via.reliefentries=4 via.polygonreliefangle="90 Angle" via.airgapwidth=10
PolygonConnect PolygonConnect_6 [All vs IsNamedPolygon('1V8_L07_P002')] p17: thpad.connectstyle=Direct thpad.reliefconductorwidth=10 thpad.reliefentries=4 thpad.polygonreliefangle="90 Angle" thpad.airgapwidth=10 smdpad.connectstyle=Relief smdpad.reliefconductorwidth=10 smdpad.reliefentries=4 smdpad.polygonreliefangle="90 Angle" smdpad.airgapwidth=10 via.connectstyle=Direct via.reliefconductorwidth=10 via.reliefentries=4 via.polygonreliefangle="90 Angle" via.airgapwidth=10
PolygonConnect PolygonConnect_5 [All vs IsNamedPolygon('1V8_L03_P003')] p18: thpad.connectstyle=Direct thpad.reliefconductorwidth=10 thpad.reliefentries=4 thpad.polygonreliefangle="90 Angle" thpad.airgapwidth=10 smdpad.connectstyle=Relief smdpad.reliefconductorwidth=10 smdpad.reliefentries=4 smdpad.polygonreliefangle="90 Angle" smdpad.airgapwidth=10 via.connectstyle=Direct via.reliefconductorwidth=10 via.reliefentries=4 via.polygonreliefangle="90 Angle" via.airgapwidth=10
PolygonConnect PolygonConnect_4 [All vs IsNamedPolygon('1V0_L07_P000')] p19: thpad.connectstyle=Direct thpad.reliefconductorwidth=10 thpad.reliefentries=4 thpad.polygonreliefangle="90 Angle" thpad.airgapwidth=10 smdpad.connectstyle=Relief smdpad.reliefconductorwidth=10 smdpad.reliefentries=4 smdpad.polygonreliefangle="90 Angle" smdpad.airgapwidth=10 via.connectstyle=Direct via.reliefconductorwidth=10 via.reliefentries=4 via.polygonreliefangle="90 Angle" via.airgapwidth=10
PolygonConnect PolygonConnect_3 [All vs IsNamedPolygon('1V0_L06_P001')] p20: thpad.connectstyle=Direct thpad.reliefconductorwidth=10 thpad.reliefentries=4 thpad.polygonreliefangle="90 Angle" thpad.airgapwidth=10 smdpad.connectstyle=Relief smdpad.reliefconductorwidth=10 smdpad.reliefentries=4 smdpad.polygonreliefangle="90 Angle" smdpad.airgapwidth=10 via.connectstyle=Direct via.reliefconductorwidth=10 via.reliefentries=4 via.polygonreliefangle="90 Angle" via.airgapwidth=10
PolygonConnect PolygonConnect_2 [All vs IsNamedPolygon('1V0_L07_P000')] p21: thpad.connectstyle=Direct thpad.reliefconductorwidth=10 thpad.reliefentries=4 thpad.polygonreliefangle="90 Angle" thpad.airgapwidth=10 smdpad.connectstyle=Relief smdpad.reliefconductorwidth=10 smdpad.reliefentries=4 smdpad.polygonreliefangle="90 Angle" smdpad.airgapwidth=10 via.connectstyle=Direct via.reliefconductorwidth=10 via.reliefentries=4 via.polygonreliefangle="90 Angle" via.airgapwidth=10
PolygonConnect PolygonConnect_1 [All vs IsNamedPolygon('1V0_L07_P000')] p22: thpad.connectstyle=Direct thpad.reliefconductorwidth=10 thpad.reliefentries=4 thpad.polygonreliefangle="90 Angle" thpad.airgapwidth=10 smdpad.connectstyle=Relief smdpad.reliefconductorwidth=10 smdpad.reliefentries=4 smdpad.polygonreliefangle="90 Angle" smdpad.airgapwidth=10 via.connectstyle=Direct via.reliefconductorwidth=10 via.reliefentries=4 via.polygonreliefangle="90 Angle" via.airgapwidth=10
PolygonConnect [All] p23: connectstyle=Relief reliefconductorwidth=10 reliefentries=4 polygonreliefangle="90 Angle" airgapwidth=10
RoutingVias [All] p1: holewidth=8 width=16 viastyle="Through Hole" minholewidth=6 minwidth=12 maxholewidth=500 maxwidth=500
ShortCircuit ShortCircuit_1 [InComponent('J3') Or InComponent('J6')  Or InComponent('U18') Or InComponent('U19')] p1: allowed=TRUE
ShortCircuit [All] p2: allowed=FALSE
SilkToSilkClearance [All] p1: silktosilkclearance=0
SilkToSolderMaskClearance [IsPad] p1: minsilkscreentomaskgap=0 clearancetoexposedcopper=TRUE
SolderMaskExpansion [All] p1: expansion=4 istentingtop=FALSE
Width [All] p1: maxlimit=100 minlimit=3.5 preferedwidth=5 toplayer_prefwidth=4.2 bottomlayer_prefwidth=4.2 minimp=50.000000 maximp=50.000000 favimp=50.000000
19 further rules are at their usual default settings.

## Classes and differential pairs
net class USER_IO: USER_IO1_N USER_IO1_P USER_IO2_N USER_IO2_P USER_IO3_N USER_IO3_P USER_IO4_N USER_IO4_P USER_IO5_N USER_IO5_P USER_IO6_N USER_IO6_P
net class DDR3_D3: DDR3_D24 DDR3_D25 DDR3_D26 DDR3_D27 DDR3_D28 DDR3_D29 DDR3_D30 DDR3_D31 DDR3_DM3 DDR3_DQS3_N DDR3_DQS3_P
net class DDR3_D2: DDR3_D16 DDR3_D17 DDR3_D18 DDR3_D19 DDR3_D20 DDR3_D21 DDR3_D22 DDR3_D23 DDR3_DM2 DDR3_DQS2_N DDR3_DQS2_P
net class DDR3_D1: DDR3_D8 DDR3_D9 DDR3_D10 DDR3_D11 DDR3_D12 DDR3_D13 DDR3_D14 DDR3_D15 DDR3_DM1 DDR3_DQS1_N DDR3_DQS1_P
net class DDR3_D0: DDR3_D0 DDR3_D1 DDR3_D2 DDR3_D3 DDR3_D4 DDR3_D5 DDR3_D6 DDR3_D7 DDR3_DM0 DDR3_DQS0_N DDR3_DQS0_P
net class DDR3_ADDR: DDR3_A0 DDR3_A1 DDR3_A2 DDR3_A3 DDR3_A4 DDR3_A5 DDR3_A6 DDR3_A7 DDR3_A8 DDR3_A9 DDR3_A10 DDR3_A11 DDR3_A12 DDR3_A13 DDR3_A14 DDR3_BA0 DDR3_BA1 DDR3_BA2 DDR3_CAS DDR3_CKE DDR3_ODT DDR3_RAS DDR3_RESET DDR3_S0 DDR3_WE
net class USB3: USB3_RX1_N USB3_RX1_P USB3_RX2_N USB3_RX2_P USB3_SSRX_N USB3_SSRX_P USB3_SSTX_N USB3_SSTX_P USB3_TX1_1_N USB3_TX1_1_P USB3_TX1_N USB3_TX1_P USB3_TX2_1_N USB3_TX2_1_P USB3_TX2_N USB3_TX2_P USB3D_N USB3D_P
net class UHSIF: NetU24_27 NetU24_31 NetU24_78 UHSIF_AE# UHSIF_AF# UHSIF_CLK UHSIF_CS# UHSIF_DATA0 UHSIF_DATA1 UHSIF_DATA2 UHSIF_DATA3 UHSIF_DATA4 UHSIF_DATA5 UHSIF_DATA6 UHSIF_DATA7 UHSIF_DATA8 UHSIF_DATA9 UHSIF_DATA10 UHSIF_DATA11 UHSIF_DATA12 UHSIF_DATA13 UHSIF_DATA14 UHSIF_DATA15 UHSIF_DATA16 UHSIF_DATA17 UHSIF_DATA18 UHSIF_DATA19 UHSIF_DATA20 UHSIF_DATA21 UHSIF_DATA22 UHSIF_DATA23 UHSIF_DATA24 UHSIF_DATA25 UHSIF_DATA26 UHSIF_DATA27 UHSIF_DATA28 UHSIF_DATA29 UHSIF_DATA30 UHSIF_DATA31 UHSIF_EOP# UHSIF_OE# UHSIF_RD# UHSIF_RDNE UHSIF_SEL0 UHSIF_SEL1 UHSIF_WR# UHSIF_WRNF
net class AD9361_SPI: AD9361_SPI_CLK AD9361_SPI_DI AD9361_SPI_DO AD9361_SPI_ENB
net class AD9361_RF: RXA1_N RXA1_P RXA_N RXA_P RXB1_N RXB1_P RXB_N RXB_P TXA1_N TXA1_P TXA_N TXA_P TXB1_N TXB1_P TXB_N TXB_P
net class AD9361_DATA: AD9361_DATA_CLK_N AD9361_DATA_CLK_P AD9361_FB_CLK_N AD9361_FB_CLK_P AD9361_RX_D0_N AD9361_RX_D0_P AD9361_RX_D1_N AD9361_RX_D1_P AD9361_RX_D2_N AD9361_RX_D2_P AD9361_RX_D3_N AD9361_RX_D3_P AD9361_RX_D4_N AD9361_RX_D4_P AD9361_RX_D5_N AD9361_RX_D5_P AD9361_RX_FRAME_N AD9361_RX_FRAME_P AD9361_TX_D0_N AD9361_TX_D0_P AD9361_TX_D1_N AD9361_TX_D1_P AD9361_TX_D2_N AD9361_TX_D2_P AD9361_TX_D3_N AD9361_TX_D3_P AD9361_TX_D4_N AD9361_TX_D4_P AD9361_TX_D5_N AD9361_TX_D5_P AD9361_TX_FRAME_N AD9361_TX_FRAME_P
component class Clock: B2 C262 C273 C274 C275 C276 C277 C278 C279 C280 C281 C282 C283 C284 C285 C286 C287 C288 C289 C290 C291 D5 J3 J6 J9 J10 J11 R82 R83 R101 R108 R109 R111 R112 R114 R115 R123 R125 R132 R133 R135 R136 R137 R138 R139 R140 R141 R142 R143 R144 U21 U22 U23 Y6
component class ZYNQ_Power: C8 C9 C10 C11 C12 C13 C14 C15 C16 C17 C18 C19 C20 C21 C22 C23 C24 C25 C26 C27 C28 C29 C30 C31 C32 C33 C34 C35 C36 C37 C38 C39 C40 C41 C42 C43 C44 C45 C46 C47 C48 C49 C50 C51 C52 C53 C54 C55 C56 C57 C59 C60 C64 C65 C66 C67 C68 C69 C70 C71 C72 C73 C172 C173 C174 C175 C176 C180 C181 C182 C183 C184 C263 C264 C265 C266 C267 C268 C269 C270 C271 C272 C303 C304 C305 C306 C307 C308 C309 L1 L2
component class CH32H417_USB3: C1 C3 C130 C135 C149 C150 C151 C152 C153 C154 C155 C156 C157 C158 C159 C160 C161 C162 C163 C164 C169 C170 C185 C188 C198 C296 C302 J12 L3 R1 R11 R12 R77 R78 R79 R80 TP1 TP2 U14 U24 U25 U26 U27 Y1
component class Sys_Power: 1 2 3 4 C232 C234 C235 C236 C237 C238 C239 C240 C241 C242 C243 C244 C245 C246 C247 C248 C249 C250 C251 C252 C253 C254 C255 C256 C257 C258 C259 C260 C261 C292 C293 C294 D2 D3 Q2 Q3 R76 R84 R85 R86 R87 R100 R120 R121 R122 R124 R126 R127 R128 R129 R130 R131 R134 U12 U13 U15 U16 U17 U18 U19
component class PS_IO: C2 C4 C5 C6 C7 C113 D1 R3 R4 R5 R6 R7 R8 R9 R10 R15 R16 R17 R18 R19 R20 R21 R22 R23 R24 R25 R26 R27 R28 S2 S3 U9 Y2
component class PL_IO: C112 D4 J7 J8 R2 R13 R14 S1 U1
component class LAN_SD: C58 C61 C62 C63 C74 C75 C129 C132 C133 C136 C137 C138 C139 C140 C141 C142 C143 C144 C145 C146 C147 C148 C233 J2 J4 L4 R63 R64 R65 R66 R67 R68 R69 R70 R71 R72 R73 R74 R75 R89 R145 U4 U5 U6 Y3
component class JTAG: C171 C177 C178 C179 C186 C187 C189 C190 C191 C192 C193 C194 C195 C196 C197 J5 L5 R60 R61 R90 R91 R92 R93 R94 R95 R96 R97 R98 R99 R102 R103 R104 R105 R106 R107 R110 R113 U7 U8 U10 Y5
component class DDR3: C76 C77 C78 C79 C80 C81 C82 C83 C84 C85 C86 C87 C88 C89 C90 C91 C92 C93 C94 C95 C96 C97 C98 C99 C100 C101 C102 C103 C104 C105 C106 C107 C108 C109 C110 C111 C114 C115 C116 C117 C118 C119 C120 C121 C122 C123 C124 C125 C126 C127 C128 C134 C165 C166 C167 C168 R29 R30 R31 R32 R33 R34 R35 R36 R37 R38 R39 R40 R41 R42 R43 R44 R45 R46 R47 R48 R49 R50 R51 R52 R53 R54 R55 R56 R57 R58 R59 U2 U3 U20
component class AD9361: C131 C199 C200 C201 C202 C203 C204 C205 C206 C207 C208 C209 C210 C211 C212 C213 C214 C215 C216 C217 C218 C219 C297 C298 C299 C300 C301 J1 R62 R88 R116 R117 R118 R119
component class AD9361_RF: C220 C221 C222 C223 C224 C225 C226 C227 C228 C229 C230 C231 L8 L9 L10 L11 T1 T2 T3 T4 U11 X1 X2 X3 X4
differential pair USER_IO6: +USER_IO6_P -USER_IO6_N
differential pair USER_IO5: +USER_IO5_P -USER_IO5_N
differential pair USB3D: +USB3D_P -USB3D_N
differential pair USB3_TX2: +USB3_TX2_P -USB3_TX2_N
differential pair USB3_TX2_1: +USB3_TX2_1_P -USB3_TX2_1_N
differential pair USB3_TX1_1: +USB3_TX1_1_P -USB3_TX1_1_N
differential pair USB3_SSTX: +USB3_SSTX_P -USB3_SSTX_N
differential pair USB3_SSRX: +USB3_SSRX_P -USB3_SSRX_N
differential pair USB3_RX2: +USB3_RX2_P -USB3_RX2_N
differential pair USB3_RX1: +USB3_RX1_P -USB3_RX1_N
differential pair USER_IO4: +USER_IO4_P -USER_IO4_N
differential pair USER_IO3: +USER_IO3_P -USER_IO3_N
differential pair USER_IO2: +USER_IO2_P -USER_IO2_N
differential pair USER_IO1: +USER_IO1_P -USER_IO1_N
differential pair USB3_TX1: +USB3_TX1_P -USB3_TX1_N
differential pair TXB: +TXB_P -TXB_N
differential pair TXB1: +TXB1_P -TXB1_N
differential pair TXA: +TXA_P -TXA_N
differential pair TXA1: +TXA1_P -TXA1_N
differential pair RXB: +RXB_P -RXB_N
differential pair RXB1: +RXB1_P -RXB1_N
differential pair RXA: +RXA_P -RXA_N
differential pair RXA1: +RXA1_P -RXA1_N
differential pair MDI3: +MDI3_P -MDI3_N
differential pair MDI2: +MDI2_P -MDI2_N
differential pair MDI1: +MDI1_P -MDI1_N
differential pair MDI0: +MDI0_P -MDI0_N
differential pair JTAG_USB: +JTAG_USB_P -JTAG_USB_N
differential pair DDR3_DQS3: +DDR3_DQS3_P -DDR3_DQS3_N
differential pair DDR3_DQS2: +DDR3_DQS2_P -DDR3_DQS2_N
differential pair DDR3_DQS1: +DDR3_DQS1_P -DDR3_DQS1_N
differential pair DDR3_DQS0: +DDR3_DQS0_P -DDR3_DQS0_N
differential pair DDR3_CLK0: +DDR3_CLK0_P -DDR3_CLK0_N
differential pair AD9361_TX_FRAME: +AD9361_TX_FRAME_P -AD9361_TX_FRAME_N
differential pair AD9361_TX_D5: +AD9361_TX_D5_P -AD9361_TX_D5_N
differential pair AD9361_TX_D4: +AD9361_TX_D4_P -AD9361_TX_D4_N
differential pair AD9361_TX_D3: +AD9361_TX_D3_P -AD9361_TX_D3_N
differential pair AD9361_TX_D2: +AD9361_TX_D2_P -AD9361_TX_D2_N
differential pair AD9361_TX_D1: +AD9361_TX_D1_P -AD9361_TX_D1_N
differential pair AD9361_TX_D0: +AD9361_TX_D0_P -AD9361_TX_D0_N
differential pair AD9361_RX_FRAME: +AD9361_RX_FRAME_P -AD9361_RX_FRAME_N
differential pair AD9361_RX_D5: +AD9361_RX_D5_P -AD9361_RX_D5_N
differential pair AD9361_RX_D4: +AD9361_RX_D4_P -AD9361_RX_D4_N
differential pair AD9361_RX_D3: +AD9361_RX_D3_P -AD9361_RX_D3_N
differential pair AD9361_RX_D2: +AD9361_RX_D2_P -AD9361_RX_D2_N
differential pair AD9361_RX_D1: +AD9361_RX_D1_P -AD9361_RX_D1_N
differential pair AD9361_RX_D0: +AD9361_RX_D0_P -AD9361_RX_D0_N
differential pair AD9361_FB_CLK: +AD9361_FB_CLK_P -AD9361_FB_CLK_N
differential pair AD9361_DATA_CLK: +AD9361_DATA_CLK_P -AD9361_DATA_CLK_N

## Components (designator, comment, footprint, x,y, rotation, side; value= is the part's Value field where it differs from the comment)
1 "螺丝孔" 螺丝孔 -2462,1178 r90 top locked
2 "螺丝孔" 螺丝孔 1861,1178 r90 top locked
3 "螺丝孔" 螺丝孔 1861,-1178 r90 top locked
4 "螺丝孔" 螺丝孔 -2462,-1178 r90 top locked
B2 "LMK1C1104DQFR" SON50P200X200X80-8N -1870.78,1063.87 r0 top
C1 "Cap-S" C0402-L -1211,452 r0 bottom value=100nF
C2 "Cap-S" C0402-L -508,-164.68 r270 bottom value=100nF
C3 "Cap-S" C0402-L -1351,248 r180 top value=100nF
C4 "Cap-S" C0402-L -415.69,20 r0 top value=100nF
C5 "Cap-S" C0402-L 395,-5 r180 bottom value=100nF
C6 "Cap-S" C0402-S -110.6,-158.3 r90 bottom value=100nF
C7 "Cap-S" C0402-S 141.4,-189.8 r90 bottom value=100nF
C8 "Cap-S" C0402-S -15.6,62.3 r270 bottom value=100nF
C9 "Cap-S" C0402-S -47.4,125.2 r270 bottom value=100nF
C10 "Cap-S" C0402-S 78.5,93.8 r270 bottom value=100nF
C11 "Cap-S" C0402-S 47.3,93.3 r270 bottom value=100nF
C12 "Cap-S" C0402-S 141.3,93.6 r270 bottom value=100nF
C13 "Cap-S" C0402-S 110,93.9 r270 bottom value=100nF
C14 "Cap-S" C0402-S -142,93.8 r270 bottom value=100nF
C15 "Cap-S" C0402-S 126,-80 r180 bottom value=100nF
C16 "Cap-S" C0402-S -94,-301 r180 bottom value=100nF
C17 "Cap-S" C0402-S -173.6,-158 r270 bottom value=100nF
C18 "Cap-S" C0402-S 62.7,-237.1 r180 bottom value=100nF
C19 "Cap-S" C0402-S 252,-237 r180 bottom value=100nF
C20 "Cap-S" C0402-S 173.1,-189.7 r90 bottom value=100nF
C21 "Cap-S" C0402-S 221,-300 r180 bottom value=100nF
C22 "Cap-S" C0402-S 126,-269 r180 bottom value=100nF
C23 "Cap-S" C0402-S -157.8,-236.8 r0 bottom value=100nF
C24 "Cap-S" C0402-S 31.3,46.4 r180 bottom value=100nF
C25 "Cap-S" C0402-S -47.5,62.3 r270 bottom value=100nF
C26 "Cap-S" C0402-S 94.5,46.4 r180 bottom value=100nF
C27 "Cap-S" C0402-S 0.7,-47.4 r180 bottom value=100nF
C28 "Cap-S" C0402-S -79,-64 r270 bottom value=100nF
C29 "Cap-S" C0402-S 172.7,-63.7 r270 bottom value=100nF
C30 "Cap-S" C0402-S 64,-49 r0 bottom value=100nF
C31 "Cap-S" C0402-S 127,-49 r0 bottom value=100nF
C32 "Cap-S" C0402-S 78.4,-158.4 r90 bottom value=100nF
C33 "Cap-S" C0402-S -63.3,-111.1 r0 bottom value=100nF
C34 "Cap-S" C0402-S 126,-143 r0 bottom value=100nF
C35 "Cap-S" C0402-S 47,-189.7 r90 bottom value=100nF
C36 "Cap-S" C0402-S -110,-96 r90 bottom value=100nF
C37 "Cap-S" C0402-S -158,-111 r0 bottom value=4.7uF
C38 "Cap-S" C0402-S -47.5,-63.9 r90 bottom value=100nF
C39 "Cap-S" C0402-S -47.7,-0.7 r270 bottom value=4.7uF
C40 "Cap-S" C0402-S -79.4,62.5 r270 bottom value=10uF
C41 "Cap-S" C0402-S -141.9,-158.3 r90 bottom value=10uF
C42 "Cap-S" C0402-S -268,-158.3 r90 bottom value=10uF
C43 "Cap-S" C0402-S 188.9,-142.4 r0 bottom value=10uF
C44 "Cap-S" C0402-S -267.8,-253 r90 bottom value=10uF
C45 "Cap-S" C0402-S 173.1,-284.1 r270 bottom value=10uF
C46 "Cap-S" C0402-S 63,-80 r180 bottom value=10uF
C47 "Cap-S" C0402-S -173.4,-63.7 r270 bottom value=10uF
C48 "Cap-S" C0402-S 78.5,156.6 r90 bottom value=100nF
C49 "Cap-S" C0402-S -47.5,-158.3 r90 bottom value=100nF
C50 "Cap-S" C0402-S 220.5,-174.1 r180 bottom value=100nF
C51 "Cap-S" C0402-S 110,-190 r90 bottom value=100nF
C52 "Cap-S" C0402-S -142,219.7 r90 bottom value=100nF
C53 "Cap-S" C0402-S 47,156.7 r90 bottom value=100nF
C54 "Cap-S" C0402-S -237,251.7 r90 bottom value=100nF
C55 "Cap-S" C0402-S -79,125 r270 bottom value=100nF
C56 "Cap-S" C0402-S -79.1,219.8 r270 bottom value=100nF
C57 "Cap-S" C0402-S -299,-159 r90 bottom value=100nF
C58 "Cap-S" C0402-L -938,-280 r180 top value=12pF
C59 "Cap-S" C0402-S 126,267 r180 bottom value=100nF
C60 "Cap-S" C0402-S 283.4,298.5 r0 bottom value=100nF
C61 "Cap-S" C0402-L -999,-89 r270 top value=12pF
C62 "Cap-S" C0603-M -846,17 r90 bottom value=22uF
C63 "Cap-S" C0402-L -585,-283 r180 bottom value=100nF
C64 "Cap-S" C0402-S 283.8,-111.6 r180 bottom value=100nF
C65 "Cap-S" C0402-S 204,-95 r270 bottom value=100nF
C66 "Cap-S" C0402-S 283.3,-47.8 r0 bottom value=100nF
C67 "Cap-S" C0402-S 236.3,93.8 r90 bottom value=100nF
C68 "Cap-S" C0402-S 220.4,46.5 r180 bottom value=100nF
C69 "Cap-S" C0402-S 173,251 r270 bottom value=100nF
C70 "Cap-S" C0402-S -252,-111 r0 bottom value=10uF
C71 "Cap-S" C0402-S -47.5,219.9 r270 bottom value=10uF
C72 "Cap-S" C0402-S 141.4,156.8 r270 bottom value=10uF
C73 "Cap-S" C0402-S 268,220 r270 bottom value=10uF
C74 "Cap-S" C0402-L -938,-280 r0 bottom value=1uF
C75 "Cap-S" C0402-L -585,-283 r180 top value=100nF
C76 "Cap-S" C0402-L 192.5,-964 r90 bottom value=470nF
C77 "Cap-S" C0402-L 193.5,-1039 r90 bottom value=470nF
C78 "Cap-S" C0402-L -599,-752 r180 top value=4.7uF
C79 "Cap-S" C0402-L -189,-964 r90 bottom value=470nF
C80 "Cap-S" C0402-L -396,-1046 r90 bottom value=470nF
C81 "Cap-S" C0402-L -190,-1038 r90 bottom value=4.7uF
C82 "Cap-S" C0402-L -205,-818 r180 bottom value=47nF
C83 "Cap-S" C0402-L -99,-786 r180 bottom value=47nF
C84 "Cap-S" C0402-L -99,-750.86 r180 bottom value=47nF
C85 "Cap-S" C0402-L -484,-639 r270 bottom value=47nF
C86 "Cap-S" C0402-L -397,-971 r90 bottom value=47nF
C87 "Cap-S" C0402-L -484,-789 r90 bottom value=47nF
C88 "Cap-S" C0402-L -484,-714 r90 bottom value=47nF
C89 "Cap-S" C0402-L -99,-715.71 r180 bottom value=47nF
C90 "Cap-S" C0402-L -99,-575.14 r180 bottom value=47nF
C91 "Cap-S" C0402-L -99,-540 r180 bottom value=47nF
C92 "Cap-S" C0402-L -419,-906 r0 bottom value=47nF
C93 "Cap-S" C0402-L -99,-610.29 r180 bottom value=47nF
C94 "Cap-S" C0402-L -99,-680.57 r180 bottom value=47nF
C95 "Cap-S" C0402-L -99,-645.43 r180 bottom value=47nF
C96 "Cap-S" C0402-L -484,-564.32 r90 bottom value=47nF
C97 "Cap-S" C0402-L 505,-750.86 r180 bottom value=47nF
C98 "Cap-S" C0402-L 505,-715.71 r180 bottom value=47nF
C99 "Cap-S" C0402-L 505,-680.57 r180 bottom value=47nF
C100 "Cap-S" C0402-L 505,-645.43 r180 bottom value=47nF
C101 "Cap-S" C0402-L 118,-565 r90 bottom value=47nF
C102 "Cap-S" C0402-L 118,-727.67 r90 bottom value=47nF
C103 "Cap-S" C0402-L 118.09,-809 r270 bottom value=47nF
C104 "Cap-S" C0402-L 118,-646.33 r90 bottom value=47nF
C105 "Cap-S" C0402-L 505,-575.14 r180 bottom value=47nF
C106 "Cap-S" C0402-L 505,-540 r180 bottom value=47nF
C107 "Cap-S" C0402-L 505,-786 r180 bottom value=47nF
C108 "Cap-S" C0402-L 505,-610.29 r180 bottom value=47nF
C109 "Cap-S" C0402-L 399,-817 r180 bottom value=47nF
C110 "Cap-S" C0402-L 414,-978 r90 bottom value=47nF
C111 "Cap-S" C0402-L 414,-1053 r90 bottom value=47nF
C112 "Cap-S" C0402-L -872.1,-972.9 r270 top value=100nF
C113 "Cap-S" C0402-L -1261.1,-984.7 r270 top value=100nF
C114 "Cap-S" C0402-L -130,-1232 r0 bottom value=100nF
C115 "Cap-S" C0402-L 159.69,-1216 r180 bottom value=100nF
C116 "Cap-S" C0402-L -130,-1171 r0 bottom value=100nF
C117 "Cap-S" C0402-L -130,-1201 r0 bottom value=100nF
C118 "Cap-S" C0402-L 160.69,-1185 r180 bottom value=100nF
C119 "Cap-S" C0402-L 160,-1124 r180 bottom value=4.7uF
C120 "Cap-S" C0402-L 160,-1154 r180 bottom value=4.7uF
C121 "Cap-S" C0402-L -130,-1108 r0 bottom value=4.7uF
C122 "Cap-S" C0402-L -130,-1139 r0 bottom value=10nF
C123 "Cap-S" C0402-L -444,-836 r270 bottom value=10nF
C124 "Cap-S" C0402-L 173,-826 r270 bottom value=10nF
C125 "Cap-S" C0603-L -597,-1050 r0 top value=10uF
C126 "Cap-S" C0603-L -494,-876 r270 bottom value=4.7uF
C127 "Cap-S" C0402-L -221,-952 r90 bottom value=10nF
C128 "Cap-S" C0402-L 389,-899 r270 bottom value=10nF
C129 "Cap-S" C0402-L -611,-502 r180 bottom value=100nF
C130 "Cap-S" C0402-L -494,460 r0 top value=100nF
C131 "Cap-S" C0402-L 769,-93 r0 top value=100nF
C132 "Cap-S" C0402-L -1214.21,-499.04 r180 bottom value=100nF
C133 "Cap-S" C0402-L -1265.1,-616.01 r90 bottom value=100nF
C134 "Cap-S" C0603-L -597,-1097 r0 top value=10uF
C135 "Cap-S" C0402-L -495,313 r0 bottom value=100nF
C136 "Cap-S" C0402-L -842.69,-76 r0 bottom value=100nF
C137 "Cap-S" C0402-L -756.31,-76 r180 bottom value=1uF
C138 "Cap-S" C0402-L -639,-2 r90 bottom value=100nF
C139 "Cap-S" C0402-L -832.09,-338 r90 bottom value=100nF
C140 "Cap-S" C0402-L -719.09,-338 r90 bottom value=1uF
C141 "Cap-S" C0402-L -800,-338 r90 bottom value=100nF
C142 "Cap-S" C0603-M -1946,-341 r180 top value=100nF
C143 "Cap-S" C0402-L -805,-2 r270 bottom value=100nF
C144 "Cap-S" C0402-L -574,-244 r0 bottom value=1uF
C145 "Cap-S" C0402-L -933,-4 r270 bottom value=100nF
C146 "Cap-S" C0402-L -842,-2 r270 top value=100nF
C147 "Cap-S" C0402-L -639,-2 r270 top value=1uF
C148 "Cap-S" C0402-L -672,-2 r270 top value=100nF
C149 "Cap-S" C0402-L -495,279 r0 bottom value=100nF
C150 "Cap-S" C0402-L -1458,499 r0 top value=100nF
C151 "Cap-S" C0402-L -1458,467 r0 top value=100nF
C152 "Cap-S" C0402-L -1457.68,396 r0 top value=100nF
C153 "Cap-S" C0402-L -1457.68,365 r0 top value=100nF
C154 "Cap-S" C0402-L -739,150 r90 bottom value=100nF
C155 "Cap-S" C0603-M -733,245 r270 bottom value=10uF
C156 "Cap-S" C0402-L -772,150 r90 bottom value=100nF
C157 "Cap-S" C0603-M -778,246 r270 bottom value=10uF
C158 "Cap-S" C0402-L -787,677 r90 bottom value=100nF
C159 "Cap-S" C0402-L -873.09,677 r90 bottom value=100nF
C160 "Cap-S" C0603-M -914.5,698 r90 bottom value=2.2uF
C161 "Cap-S" C0402-L -1075,471 r0 top value=12pF
C162 "Cap-S" C0402-L -1075,307 r180 top value=12pF
C163 "Cap-S" C0402-L -1070,569 r0 top value=100nF
C164 "Cap-S" C0402-L -1055.69,503 r0 bottom value=100nF
C165 "Cap-S" C0402-L -484,-1043 r270 top value=100nF
C166 "Cap-S" C0402-L -596.69,-880 r0 bottom value=10nF
C167 "Cap-S" C0603-L -596,-791 r0 top value=10uF
C168 "Cap-S" C0603-L -597,-839 r0 top value=10uF
C169 "Cap-S" C0603-M -1075,462 r0 bottom value=2.2uF
C170 "Cap-S" C0402-L -1056,370 r0 bottom value=100nF
C171 "Cap-S" C0805-L -2259,-27 r180 bottom value=22uF
C172 "Cap-S" C0402-S 15.4,93.8 r90 bottom value=4.7uF
C173 "Cap-S" C0402-S -110.2,93.6 r270 bottom value=4.7uF
C174 "Cap-S" C0402-S -300,-252 r90 bottom value=4.7uF
C175 "Cap-S" C0402-S -236.4,-252.7 r270 bottom value=4.7uF
C176 "Cap-S" C0402-S -173.5,62 r270 bottom value=4.7uF
C177 "Cap-S" C0402-L -1647.34,20 r0 top value=4.7uF
C178 "Cap-S" C0603-L -2259,33 r180 top value=10uF
C179 "Cap-S" C0402-L -1730.34,-39 r0 top value=100nF
C180 "Cap-S" C0402-S -141.9,-63.7 r270 bottom value=4.7uF
C181 "Cap-S" C0402-S 235.9,-126.7 r270 bottom value=4.7uF
C182 "Cap-S" C0402-S -236.5,-158.4 r90 bottom value=4.7uF
C183 "Cap-S" C0402-S -47.6,282.4 r90 bottom value=4.7uF
C184 "Cap-S" C0402-S -78.9,282.6 r90 bottom value=4.7uF
C185 "Cap-S" C0603-M -1076,412 r0 bottom value=10uF
C186 "Cap-S" C0402-L -1298.34,-311 r90 top value=100nF
C187 "Cap-S" C0402-L -1647.34,85 r0 top value=4.7uF
C188 "Cap-S" C0402-L -1073,300 r0 bottom value=100nF
C189 "Cap-S" C0402-L -1647.34,-252 r0 top value=100nF
C190 "Cap-S" C0402-L -1330.34,-311 r90 top value=100nF
C191 "Cap-S" C0402-L -1320.34,181 r270 top value=100nF
C192 "Cap-S" C0402-L -1157.34,-130 r180 top value=100nF
C193 "Cap-S" C0402-L -1431.34,181 r270 top value=100nF
C194 "Cap-S" C0402-L -1157.34,63 r180 top value=100nF
C195 "Cap-S" C0402-L -1645.34,-39 r0 top value=100nF
C196 "Cap-S" C0402-L -1480.34,-313 r90 bottom value=100nF
C197 "Cap-S" C0402-L -1392,-310 r270 top value=4.7uF
C198 "Cap-S" C0402-L -1073,263 r0 bottom value=100nF
C199 "Cap-S" C0402-L 830.5,182.46 r180 top value=100nF
C200 "Cap-S" C0402-L 1282.5,-46.54 r270 bottom value=1uF
C201 "Cap-S" C0402-L 1228.5,-29.54 r180 bottom value=1nF
C202 "Cap-S" C0402-L 826.5,-318.54 r0 bottom value=1uF
C203 "Cap-S" C0402-L 808.5,-266.54 r90 bottom value=1nF
C204 "Cap-S" C0402-L 1021.5,-186.54 r270 bottom value=1uF
C205 "Cap-S" C0402-L 773.5,-30.54 r90 bottom value=100nF
C206 "Cap-S" C0402-L 1102.5,141.46 r270 bottom value=1uF
C207 "Cap-S" C0402-L 1070.5,141.46 r270 bottom value=100nF
C208 "Cap-S" C0402-L 1230,-159 r180 bottom value=1uF
C209 "Cap-S" C0402-L 1230,-191 r180 bottom value=100nF
C210 "Cap-S" C0402-L 912.5,-306.54 r90 bottom value=1uF
C211 "Cap-S" C0402-L 880.5,-321.54 r90 top value=100nF
C212 "Cap-S" C0402-L 1204.18,51.46 r180 bottom value=100nF
C213 "Cap-S" C0603-L 1215.5,12.46 r180 bottom value=10uF
C214 "Cap-S" C0402-L 962.5,-203.54 r270 bottom value=1uF
C215 "Cap-S" C0402-L 899.5,-201.54 r270 bottom value=100nF
C216 "Cap-S" C0402-L 1230.5,-127.54 r180 bottom value=1uF
C217 "Cap-S" C0402-L 1229.5,-96.54 r180 bottom value=100nF
C218 "Cap-S" C0402-L 1204.5,84.46 r180 bottom value=100nF
C219 "Cap-S" C0603-L 1213.5,125.46 r180 bottom value=10uF
C220 "Cap-S" C0402-L 1241.9,228.46 r0 top value=18pF
C221 "Cap-S" C0402-L 1241.9,194.46 r0 top value=18pF
C222 "Cap-S" C0402-L 1243.4,-320.74 r0 top value=18pF
C223 "Cap-S" C0402-L 1243.4,-354.74 r0 top value=18pF
C224 "Cap-S" C0402-L 974.5,229.46 r270 top value=18pF
C225 "Cap-S" C0402-L 1009.5,229.46 r270 top value=18pF
C226 "Cap-S" C0603-L 1018.5,207.46 r90 bottom value=100nF
C227 "Cap-S" C0603-L 966.5,207.46 r90 bottom value=10uF
C228 "Cap-S" C0402-L 1012.5,-350.54 r90 top value=18pF
C229 "Cap-S" C0402-L 977.48,-350.54 r90 top value=18pF
C230 "Cap-S" C0603-L 968.5,-331.54 r270 bottom value=100nF
C231 "Cap-S" C0603-L 1021.5,-331.54 r270 bottom value=10uF
C232 "Cap-S" C0805-L 249,1083.37 r0 top value=10uF
C233 "Cap-S" C1206-L -2222,-658 r180 bottom value=100pF/1000V
C234 "Cap-S" C0805-L 249,877.37 r180 top value=22uF
C235 "Cap-S" C0402-L 1024.77,716.93 r90 top value=470nF
C236 "Cap-S" C0805-L -496,933.69 r90 top value=10uF
C237 "Cap-S" C0805-L -843,934.69 r90 top value=10uF
C238 "Cap-S" C0805-L -599,818.69 r0 top value=47uF
C239 "Cap-S" C0402-L 337,957.37 r270 top value=3.3nF
C240 "Cap-S" C0603-L 976.77,727.93 r90 top value=10uF
C241 "Cap-S" C0805-L -737,819.69 r0 top value=47uF
C242 "Cap-S" C0603-L -669,932.69 r270 bottom value=2.2uF
C243 "Cap-S" C0402-L -512,1036 r270 top value=100nF
C244 "Cap-S" C0805-L -294.56,1086.69 r0 top value=10uF
C245 "Cap-S" C0805-L -24,1088.37 r0 top value=10uF
C246 "Cap-S" C0402-L -824,1038 r270 top value=100nF
C247 "Cap-S" C0805-L -294.56,880.69 r180 top value=22uF
C248 "Cap-S" C0603-L 249,814.37 r180 top value=10uF
C249 "Cap-S" C0402-L -206.56,960.69 r270 top value=3.3nF
C250 "Cap-S" C0402-L 64,962.37 r270 top value=3.3nF
C251 "Cap-S" C0402-L -1202.48,1056.27 r180 top value=100nF
C252 "Cap-S" C0402-L -1063.48,904.27 r0 top value=56nF
C253 "Cap-S" C0603-L 739.77,727.93 r270 top value=10uF
C254 "Cap-S" C0402-L 693.77,715.93 r270 top value=100nF
C255 "Cap-S" C0603-L 976.77,619.93 r90 top value=4.7uF
C256 "Cap-S" C0402-L 1030,-748 r90 top value=470nF
C257 "Cap-S" C0603-L 981.98,-736.6 r90 top value=10uF
C258 "Cap-S" C0603-L 744.98,-736.6 r270 top value=10uF
C259 "Cap-S" C0402-L 699,-748 r270 top value=100nF
C260 "Cap-S" C0603-L 981.98,-844.6 r90 top value=4.7uF
C261 "Cap-S" C0402-L -1339.48,904.27 r180 top value=56nF
C262 "Cap-S" C0402-L -2188.35,929.03 r90 top value=100nF
C263 "Cap-S" C0402-S 47,-126.8 r90 bottom value=470nF
C264 "Cap-S" C0402-S 95,-112 r180 bottom value=470nF
C265 "Cap-S" C0402-S 158,-112 r180 bottom value=470nF
C266 "Cap-S" C0402-S -125.9,46.6 r0 bottom value=470nF
C267 "Cap-S" C0402-S -79,-0.7 r270 bottom value=470nF
C268 "Cap-S" C0402-S -79,-158.4 r90 bottom value=470nF
C269 "Cap-S" C0402-S -251,173 r180 bottom value=470nF
C270 "Cap-S" C0402-S -284,78 r180 bottom value=470nF
C271 "Cap-S" C0402-S -237,63 r270 bottom value=470nF
C272 "Cap-S" C0402-S -174,157 r270 bottom value=470nF
C273 "Cap-S" C0402-L -2119.66,855.35 r0 top value=1uF
C274 "Cap-S" C0402-L -2159.35,689.35 r90 top value=100nF
C275 "Cap-S" C0402-L -1959.35,719.66 r270 top value=100nF
C276 "Cap-S" C0402-L -1699.35,851.35 r270 top value=180pF
C277 "Cap-S" C0402-L -1758.35,918.35 r0 top value=82pF
C278 "Cap-S" C0402-L -1854.35,932.35 r270 top value=100nF
C279 "Cap-S" C0402-L -1819.35,932.35 r270 top value=100pF
C280 "Cap-S" C0402-L -1633.35,851.35 r270 top value=2.2nF
C281 "Cap-S" C0402-L -1676.35,727.35 r180 top value=100nF
C282 "Cap-S" C0402-L -1676.35,696.35 r180 top value=100nF
C283 "Cap-S" C0402-L -1924.35,932.35 r270 top value=100nF
C284 "Cap-S" C0402-L -1889.35,932.35 r270 top value=100nF
C285 "Cap-S" C0402-L -1982.35,988.35 r0 top value=10nF
C286 "Cap-S" C0402-L -2186.35,1075.35 r90 top value=470pF
C287 "Cap-S" C0402-L -1762.35,1033.35 r0 top value=1uF
C288 "Cap-S" C0402-L -1869.35,1132.35 r0 top value=100nF
C289 "Cap-S" C0402-L -2071.35,1162.35 r180 top value=100nF
C290 "Cap-S" C0402-L 809.5,-321.54 r90 top value=18pF
C291 "Cap-S" C0402-L 1268,-62 r180 top value=18pF
C292 "Cap-S" C0603-L -294.56,817.69 r180 top value=10uF
C293 "Cap-S" C0805-L -24,882.37 r180 top value=22uF
C294 "Cap-S" C0603-L -24,819.37 r180 top value=10uF
C296 "Cap-S" C0805-L -2279,486 r180 bottom value=22uF
C297 "Cap-S" C0402-L 1155.5,-202.54 r90 bottom value=100nF
C298 "Cap-S" C0402-L 879.5,-306.23 r90 bottom value=100nF
C299 "Cap-S" C0402-L 930.5,-202.54 r270 bottom value=100nF
C300 "Cap-S" C0402-L 1150.5,-64.54 r0 bottom value=100nF
C301 "Cap-S" C0402-L 805.5,-30.54 r90 bottom value=100nF
C302 "Cap-S" C0603-L -2278,608 r180 bottom value=10uF
C303 "Cap-S" C0603-L -0.1,173.8 r270 bottom value=47uF
C304 "Cap-S" C0603-L 0.1,276.9 r90 bottom value=47uF
C305 "Cap-S" C0603-L -360.6,-272.1 r90 bottom value=47uF
C306 "Cap-S" C0603-L 128,-1 r180 bottom value=47uF
C307 "Cap-S" C0603-L 0.4,-110.5 r90 bottom value=47uF
C308 "Cap-S" C0603-L 0.9,-214.7 r90 bottom value=47uF
C309 "Cap-S" C0603-L -254,-0.4 r0 bottom value=47uF
D1 "LED" LED_0603_L -1378.6,-997 r180 top
D2 "LED" LED_0603_L -1024.48,857.27 r180 top
D3 "LED" LED_0603_L -1382.48,857.27 r0 top
D4 "WS2812C-2020" WS2812C2020 -958.8,-973.1 r180 top
D5 "LED" LED_0603_L -1687.35,622.35 r180 top
J1 "IPEX1" 20279-001E 1213.81,1020.7 r0 top
J2 "RJ45_HR911130A" RJ45-TH_HR911130A -2177,-705 r90 top
J3 "10M_EXT" 66012202111305 -2570,679.02 r270 top
J4 "TF01-A" TF-SMD_TF-01A -1206.49,-996.28 r180 bottom
J5 "Type-C" TYPE-C -2512,-127 r270 top
J6 "10M_EXT" 66012202111305 -2570,937.01 r270 top
J7 "DC-20P" HDR-TH_20P-P2.54-V-M-R2-C10-S2.54 1090,-1106.5 r180 top
J8 "XH1.25-3P" CONN-TH_3P-P1.25_CAX_1.25-3A -1721.72,-1175.4 r180 top
J9 "IPEX1" 20279-001E 732.1,1020.7 r0 top
J10 "IPEX1" 20279-001E 972.96,1020.7 r0 top
J11 "IPEX1" 20279-001E 1454.67,1020.7 r0 top
J12 "U262-241N-4BV64" USB-C-SMD_TYC-324G -2473.65,322.08 r270 top
L1 "R" R0603-L -151.6,-0.5 r180 bottom value=120ohm@100m
L2 "R" R0603-L 22,0 r0 bottom value=120ohm@100m
L3 "R" R0805-L -2280,551 r0 bottom value="120ohm@100m 3A"
L4 "R" R0603-L -574,-243 r180 top value=120ohm@100m
L5 "R" R0805-L -2259,-27 r180 top value="120ohm@100m 3A"
L8 "330nH" L0603 941.1,169.9 r0 top
L9 "330nH" L0603 1043,169.9 r180 top
L10 "330nH" L0603 1045.2,-291.2 r180 top
L11 "330nH" L0603 944.2,-291.2 r0 top
Q2 "CSD17579Q3A" FP-DNH0008A-MFG -1025.09,1025.29 r90 top
Q3 "CSD17579Q3A" FP-DNH0008A-MFG -1385.86,1025.29 r90 top
R1 "R" R0402-L -1298,552.69 r270 bottom value=200K
R2 "R" R0402-L 395,78 r180 bottom value=4.7K
R3 "R" R0402-L -356,-168 r90 bottom value=33
R4 "R" R0402-L -1060.1,-984.7 r90 top value=4.7K
R5 "R" R0402-L -415.69,-47 r0 top value=4.7K
R6 "R" R0402-L -415.69,-13 r0 top value=4.7K
R7 "R" R0402-L -415.69,20 r0 bottom value=4.7K
R8 "R" R0402-L -611,-607 r0 bottom value=33
R9 "R" R0402-L -415,-209 r180 top value=20K
R10 "R" R0402-L -612,-682 r180 bottom value=20K
R11 "R" R0402-L -1211,359 r0 top value=4.7K
R12 "R" R0402-L -1211,393 r0 top value=1M
R13 "R" R0402-L -714.7,-1164 r90 top value=4.7K
R14 "R" R0402-L -1856.9,-1187.7 r90 top value=4.7K
R15 "R" R0402-L -895.69,-563 r0 bottom value=20K
R16 "R" R0402-L -611,-643 r0 bottom value=20K
R17 "R" R0402-L -415,-172 r180 top value=20K
R18 "R" R0402-L -611,-571 r0 bottom value=10K
R19 "R" R0402-L 395,37 r0 bottom value=4.7K
R20 "R" R0402-L -611,-536 r0 bottom value=10K
R21 "R" R0402-L 395,-45 r0 bottom value=4.7K
R22 "R" R0402-L 395,-201 r0 top value=4.7K
R23 "R" R0402-L -895.68,-615 r180 bottom value=10K
R24 "R" R0402-L -895.69,-664 r0 bottom value=10K
R25 "R" R0603-L -1379.7,-947.5 r0 top value=3.3K
R26 "R" R0402-L -1060.69,-501 r0 bottom value=40.2
R27 "R" R0402-S -78.9,-221.3 r90 bottom value=80.6
R28 "R" R0402-S -110.4,-221.4 r90 bottom value=80.6
R29 "R" R0402-L -535,-901 r90 bottom value=10K
R30 "R" R0402-L -596,-816 r0 bottom value=10K
R31 "R" R0402-L -51.69,-1014.83 r0 bottom value=40.2
R32 "R" R0402-L 84.69,-1060.09 r180 bottom value=40.2
R33 "R" R0402-L -51.69,-1077.17 r0 bottom value=40.2
R34 "R" R0402-L -51.69,-1046 r0 bottom value=40.2
R35 "R" R0402-L 84.69,-1153.64 r180 bottom value=40.2
R36 "R" R0402-L -51.69,-1170.67 r0 bottom value=40.2
R37 "R" R0402-L 84.69,-1216 r180 bottom value=40.2
R38 "R" R0402-L -51.69,-1233 r0 bottom value=40.2
R39 "R" R0402-L 84.69,-1184.82 r180 bottom value=40.2
R40 "R" R0402-L -51.69,-1108.33 r0 bottom value=40.2
R41 "R" R0402-L 84.69,-966.55 r180 bottom value=40.2
R42 "R" R0402-L 84.69,-1091.27 r180 bottom value=40.2
R43 "R" R0402-L 84.69,-997.73 r180 bottom value=40.2
R44 "R" R0402-L -51.69,-1139.5 r0 bottom value=40.2
R45 "R" R0402-L 84.69,-1122.45 r180 bottom value=40.2
R46 "R" R0402-L -51.69,-983.67 r0 bottom value=40.2
R47 "R" R0402-L 84.69,-1028.91 r180 bottom value=40.2
R48 "R" R0402-L -51.69,-952.5 r0 bottom value=40.2
R49 "R" R0402-L -51.68,-921.33 r0 bottom value=40.2
R50 "R" R0402-L 84.69,-873 r180 bottom value=40.2
R51 "R" R0402-L 84.69,-904.18 r180 bottom value=40.2
R52 "R" R0402-L -51.69,-890.17 r0 bottom value=40.2
R53 "R" R0402-L -51.69,-859 r0 bottom value=40.2
R54 "R" R0402-L 84.69,-935.36 r180 bottom value=40.2
R55 "R" R0402-L -181,-875 r0 bottom value=240
R56 "R" R0402-L 420,-899 r270 bottom value=240
R57 "R" R0402-L 333,-824 r90 bottom value=80.6
R58 "R" R0402-L -51.68,-1201.83 r180 bottom value=4.7K
R59 "R" R0402-L -597,-848 r180 bottom value=10K
R60 "R" R0402-L -2278,-84 r180 top value=5.1K
R61 "R" R0402-L -2274,-225 r180 top value=5.1K
R62 "R" R0402-L 1024.5,-38.54 r270 bottom value=4.7K
R63 "R" R0402-L -894.69,-515 r0 bottom value=4.7K
R64 "R" R0402-L -770,-2 r270 bottom value=4.7K
R65 "R" R0402-L -737,-2 r270 bottom value=4.7K
R66 "R" R0402-L -704,-2 r270 bottom value=4.7K
R67 "R" R0402-L -672,-2 r270 bottom value=4.7K
R68 "R" R0402-L -770,-2 r270 top value=4.7K
R69 "R" R0402-L -996.21,-564.04 r90 bottom value=4.7K
R70 "R" R0402-L -805,-2 r270 top value=4.7K
R71 "R" R0402-L -946,-227 r180 bottom value=2.49K
R72 "R" R0402-L -965,-89 r270 top value=4.7K
R73 "R" R0402-L -932,-89 r270 top value=4.7K
R74 "R" R0603-M -2265,-1073 r180 top value=330
R75 "R" R0603-M -2263,-341 r180 top value=330
R76 "R" R0402-L 693.77,630.93 r90 top value=48.7K
R77 "R" R0402-L -1351,279 r180 bottom value=4.7K
R78 "R" R0402-L -1351,248 r180 bottom value=4.7K
R79 "R" R0402-L -1351,279 r0 top value=200K
R80 "R" R0402-L -1211,393 r180 bottom value=10K
R82 "R" R0402-L 846.5,-321.54 r270 top value=50
R83 "R" R0402-L 1269,-96 r0 top value=50
R84 "R" R0402-L 1024.77,630.93 r270 top value=8.66K
R85 "R" R0402-L 746.77,630.93 r270 top value=10K
R86 "R" R0402-L 751.98,-833.6 r90 top value=48.7K
R87 "R" R0402-L 1029.98,-833.6 r270 top value=8.66K
R88 "R" R0402-L 829.5,216.46 r180 top value=49.9
R89 "R" R0402-L -900,-89.31 r270 top value=4.7K
R90 "R" R0402-L -1647.34,52 r180 top value=120ohm@100MHz
R91 "R" R0402-L -1157.34,-258 r180 top value=22R
R92 "R" R0402-L -1157.34,-226 r180 top value=22R
R93 "R" R0402-L -1157.34,-194 r180 top value=22R
R94 "R" R0402-L -1157.34,-162 r180 top value=22R
R95 "R" R0402-L -1157.34,-258 r180 bottom value=4.7K
R96 "R" R0402-L -1157.34,-226 r180 bottom value=4.7K
R97 "R" R0402-L -1157.34,-194 r180 bottom value=4.7K
R98 "R" R0402-L -1157.34,-162 r180 bottom value=4.7K
R99 "R" R0402-L -1754.46,-144 r90 bottom value=1K
R100 "R" R0402-L 698.98,-833.6 r270 top value=10K
R101 "R" R0402-L -1701.35,935.35 r270 top value=1M
R102 "R" R0402-L -1699.34,-80 r0 bottom value=4.7K
R103 "R" R0402-L -1700.34,-205 r0 bottom value=4.7K
R104 "R" R0402-L -1690.34,-145 r90 bottom value=4.7K
R105 "R" R0402-L -1353.34,181 r270 top value=22R
R106 "R" R0402-L -1387.34,181 r270 top value=22R
R107 "R" R0402-L -1265.34,-312 r270 top value=4.7K
R108 "R" R0402-L -2100.35,651.35 r180 top value=10K
R109 "R" R0402-L -1666.35,851.35 r270 top value=100k
R110 "R" R0402-L -1445.34,-313 r90 bottom value=12K
R111 "R" R0402-L -1676.03,664.35 r0 top value=3.3K
R112 "R" R0402-L -2160.35,770.35 r90 top value=10K
R113 "R" R0402-L -1512.34,-313 r270 bottom value=120ohm@100MHz
R114 "R" R0402-L -1959.35,799.35 r90 top value=49.9
R115 "R" R0402-L -1676.35,791.35 r180 top value=47k
R116 "R" R0402-L 1228.5,-62.54 r0 bottom value=1
R117 "R" R0402-L 843.5,-266.54 r270 bottom value=1
R118 "R" R0402-L 1134.5,141.46 r90 bottom value=14.3K
R119 "R" R0402-L 1134.4,190.4 r90 top value=4.7K
R120 "R" R0402-L -669,1021.69 r270 bottom value=20K
R121 "R" R0402-L 337,1044.37 r90 top value=100K
R122 "R" R0402-L 154,956.37 r270 top value=124K
R123 "R" R0402-L -1759.35,953.35 r180 top value=1M
R124 "R" R0402-L 154,1040.37 r270 top value=100K